# Altium PCB Robot_POWER.PcbDoc (part 1 of 3)
Units mil, origin at the board's own origin, x right, y up, seen from the top; angles counter-clockwise.
Board outline 5791.97 x 4531.5 mil, 4 copper layers (Top Layer, GND02, GND03, Bottom Layer), stack 23.756 mil thick; 192 components, 81 nets, 533 pads, 1202 vias.
Unrouted connection lines stored in the file: 18.
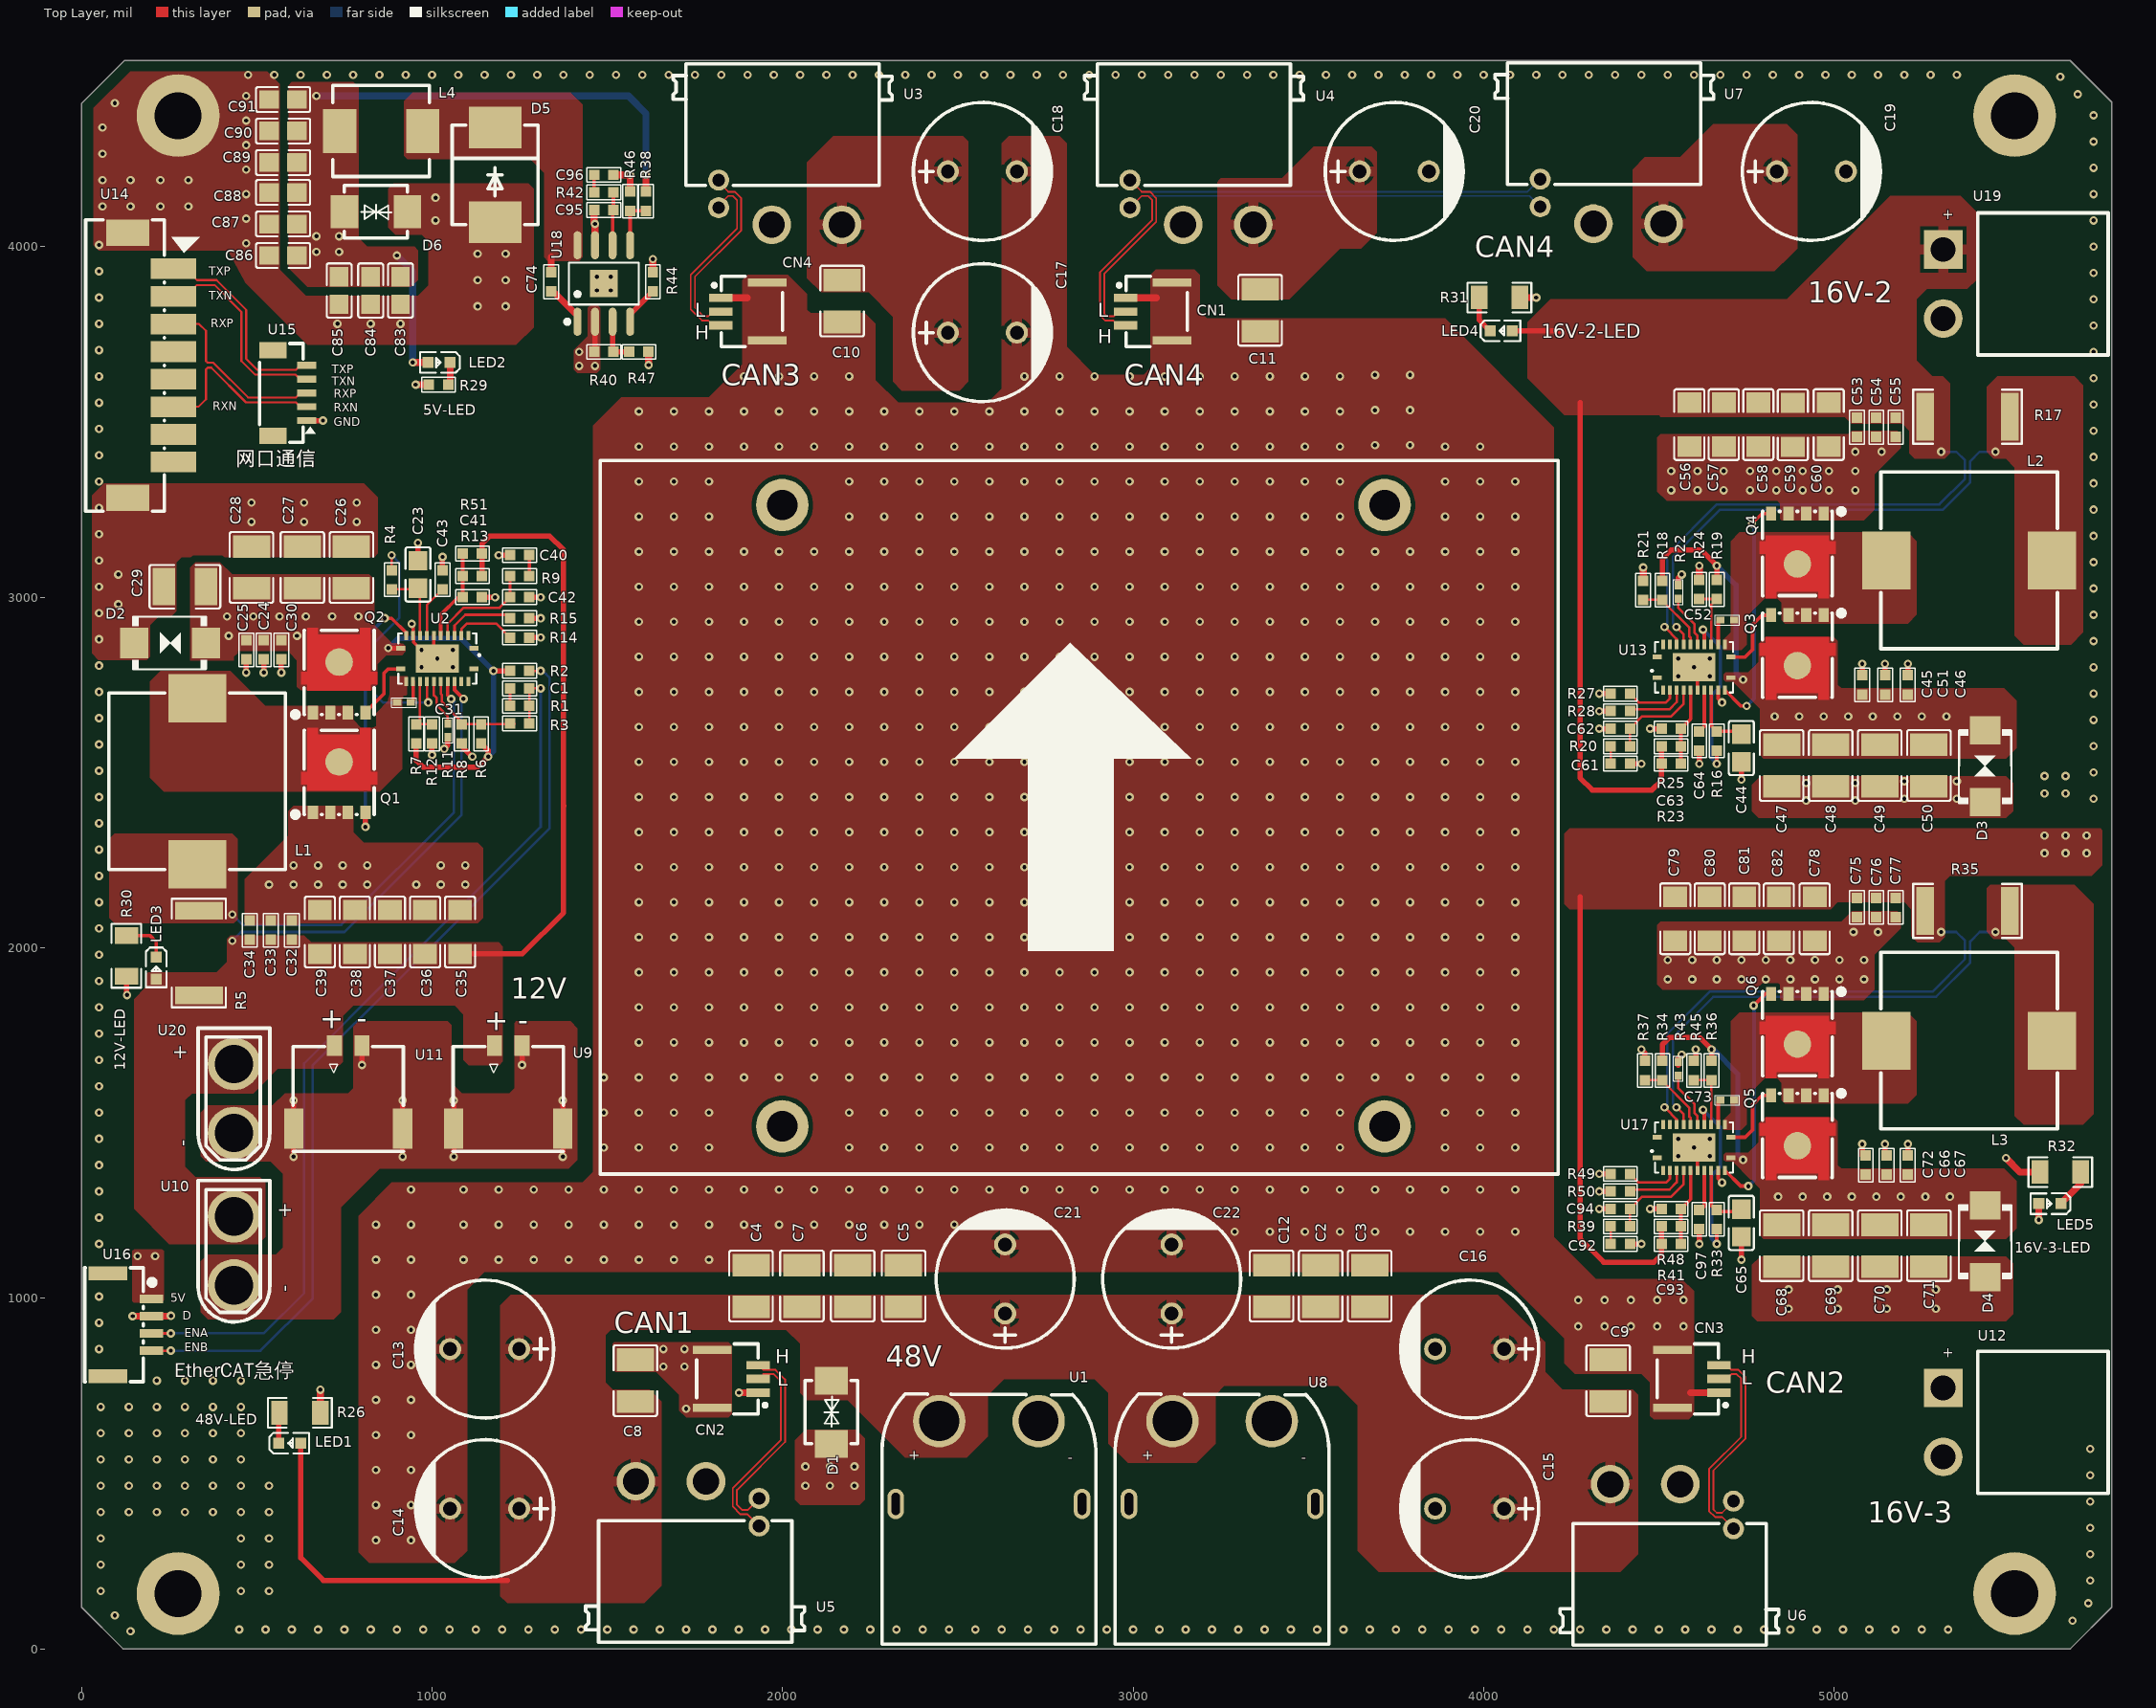
[diagram p0: Top Layer view]
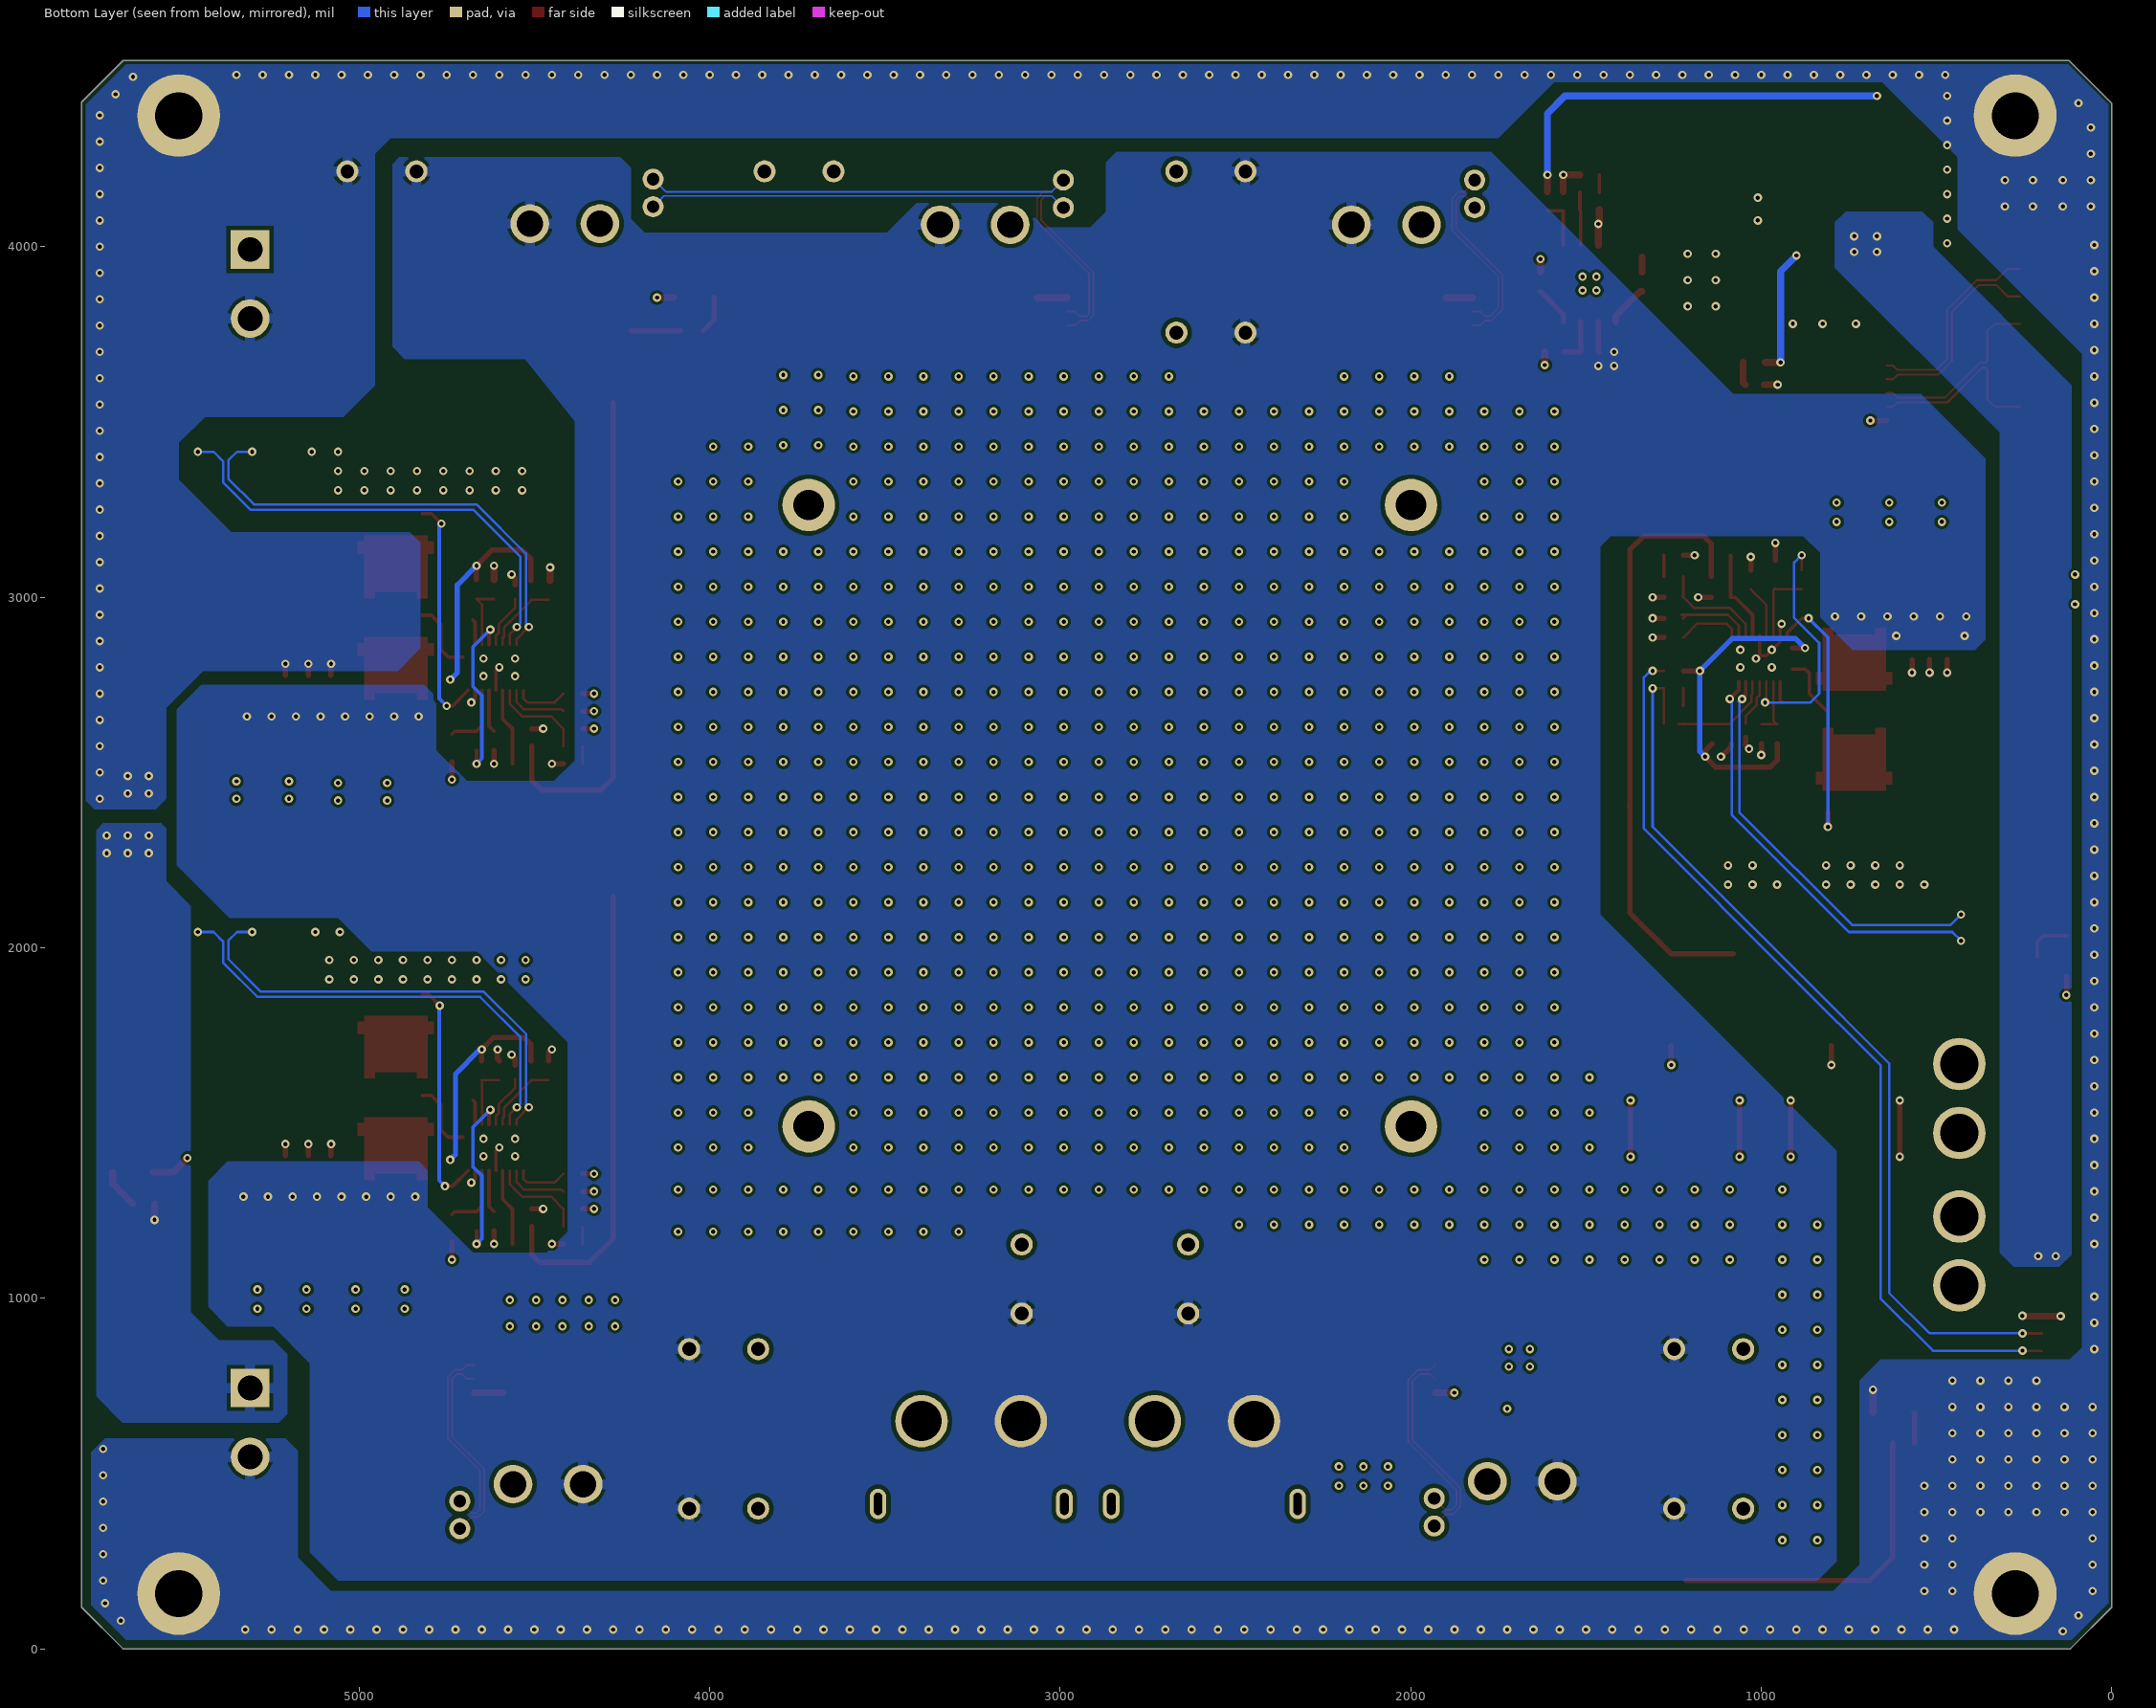
[diagram p1: Bottom Layer view, seen from below]
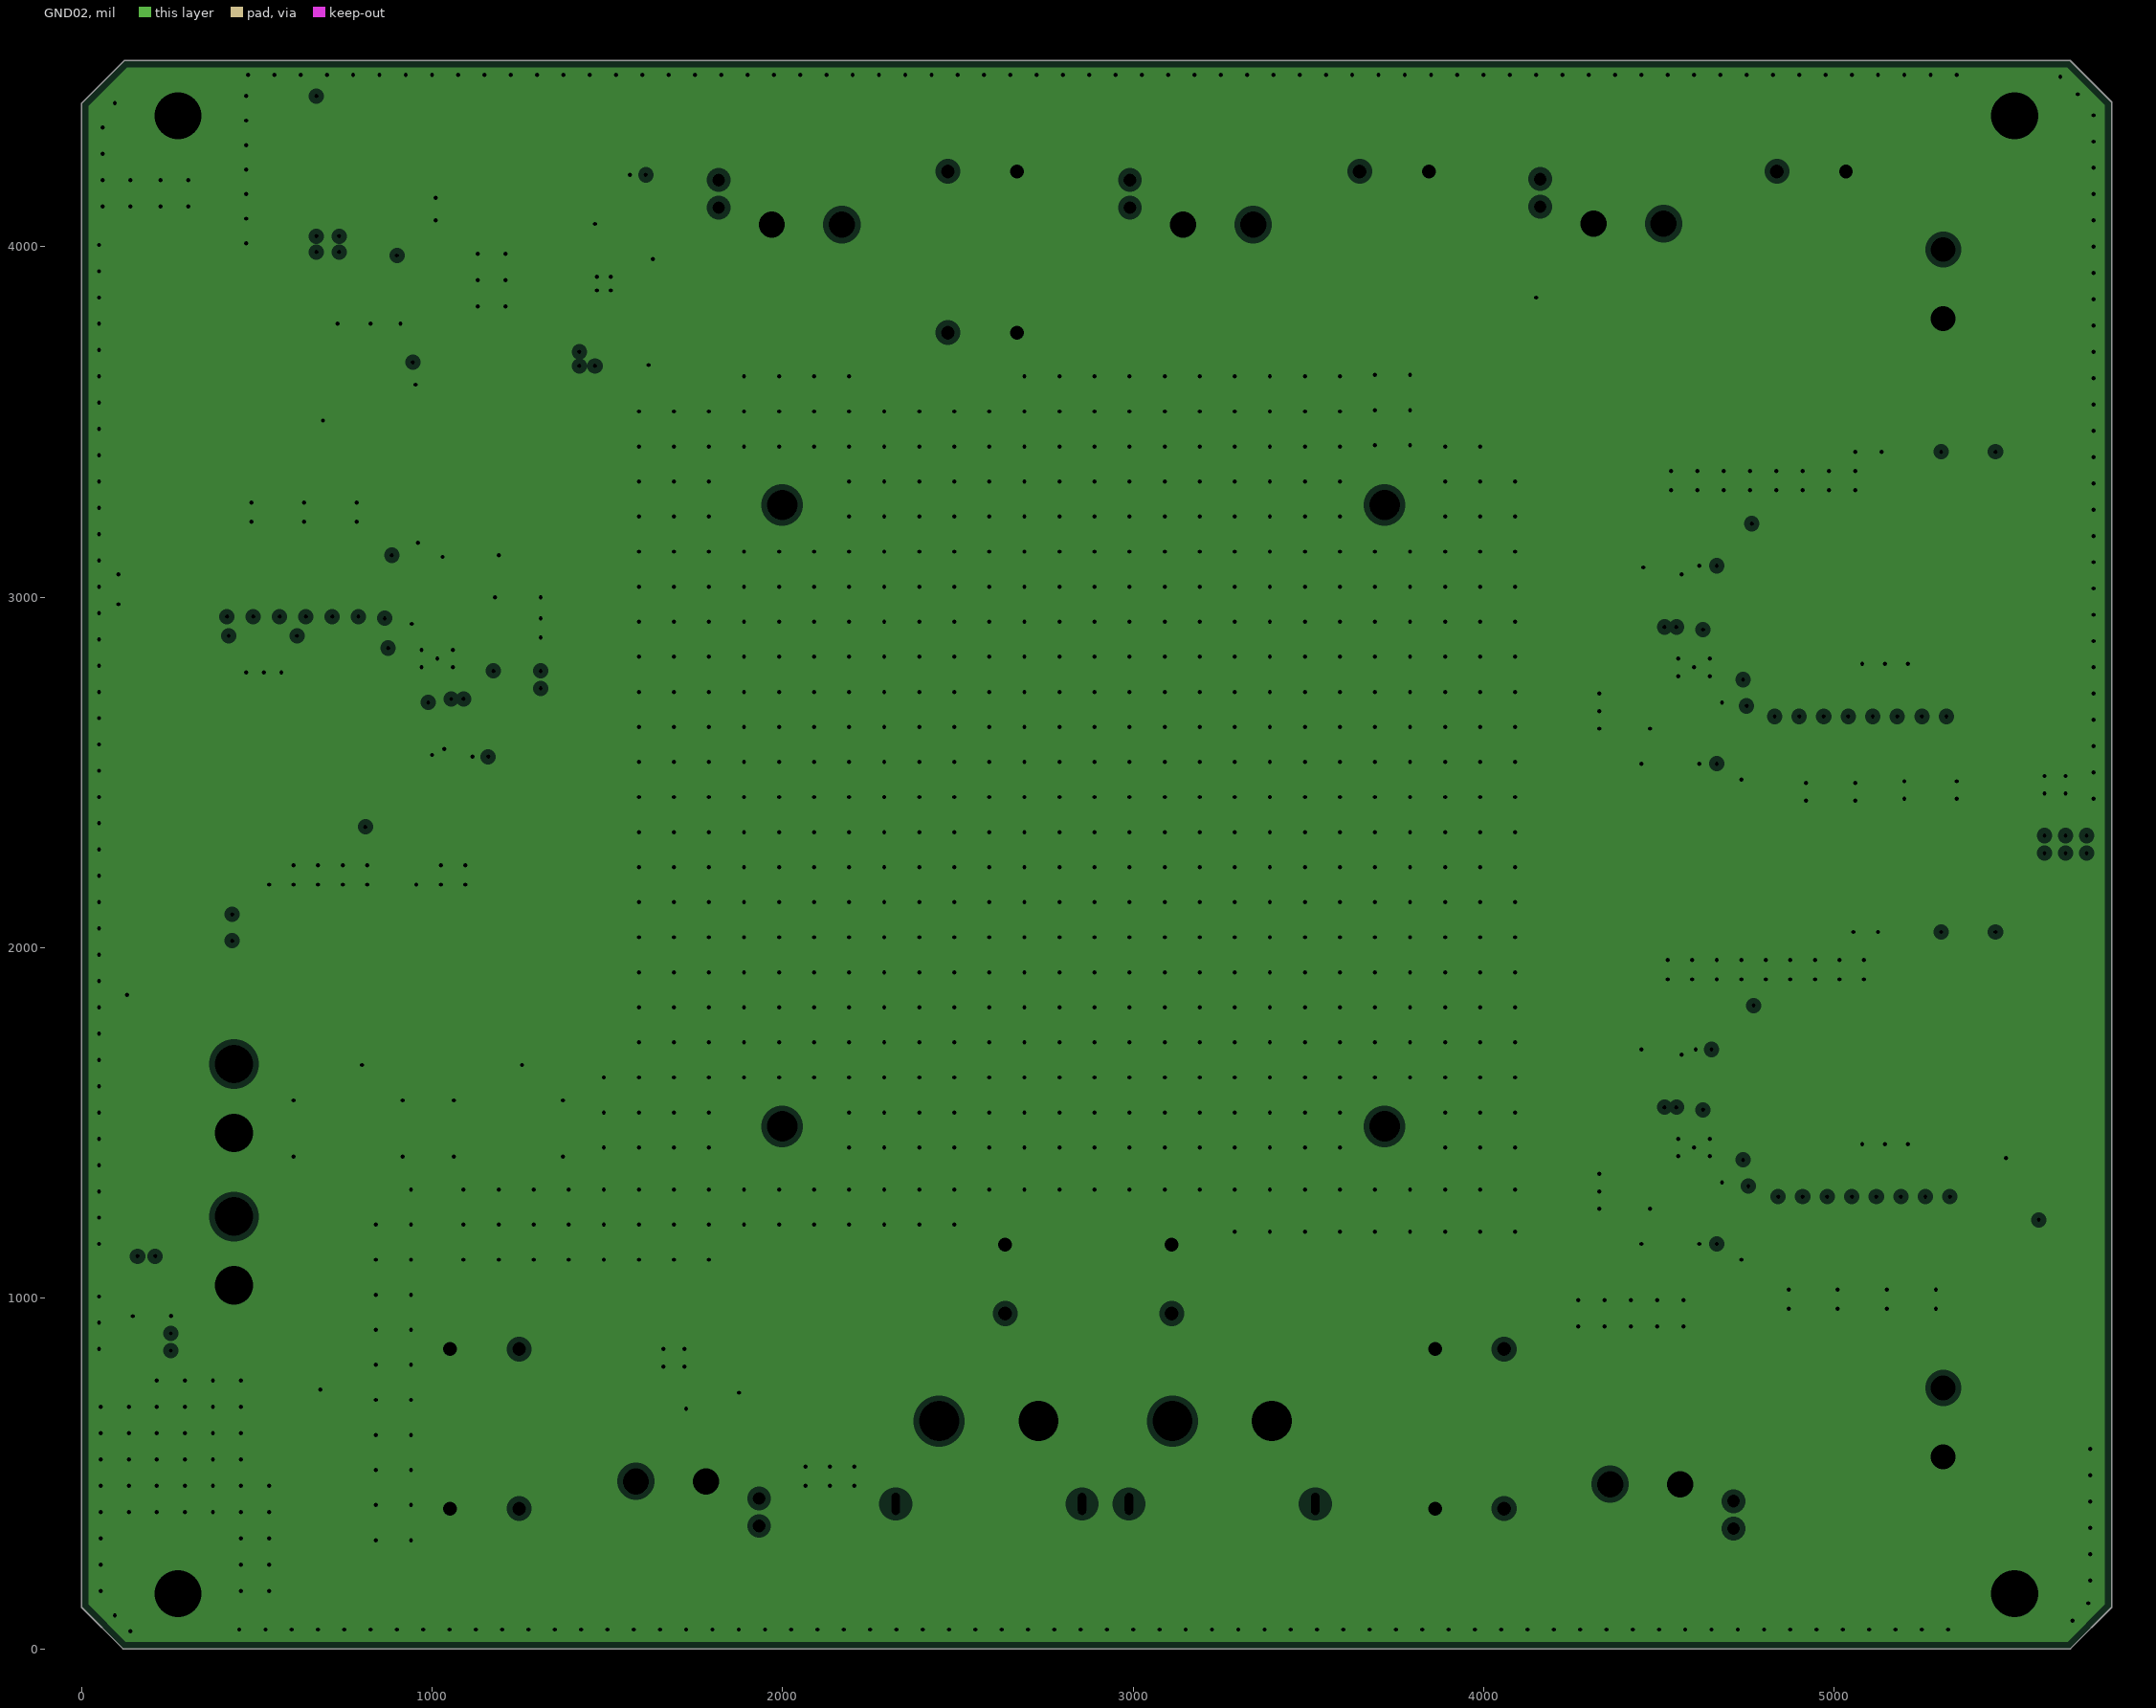
[diagram p2: GND02, clearances drawn from the general rule]
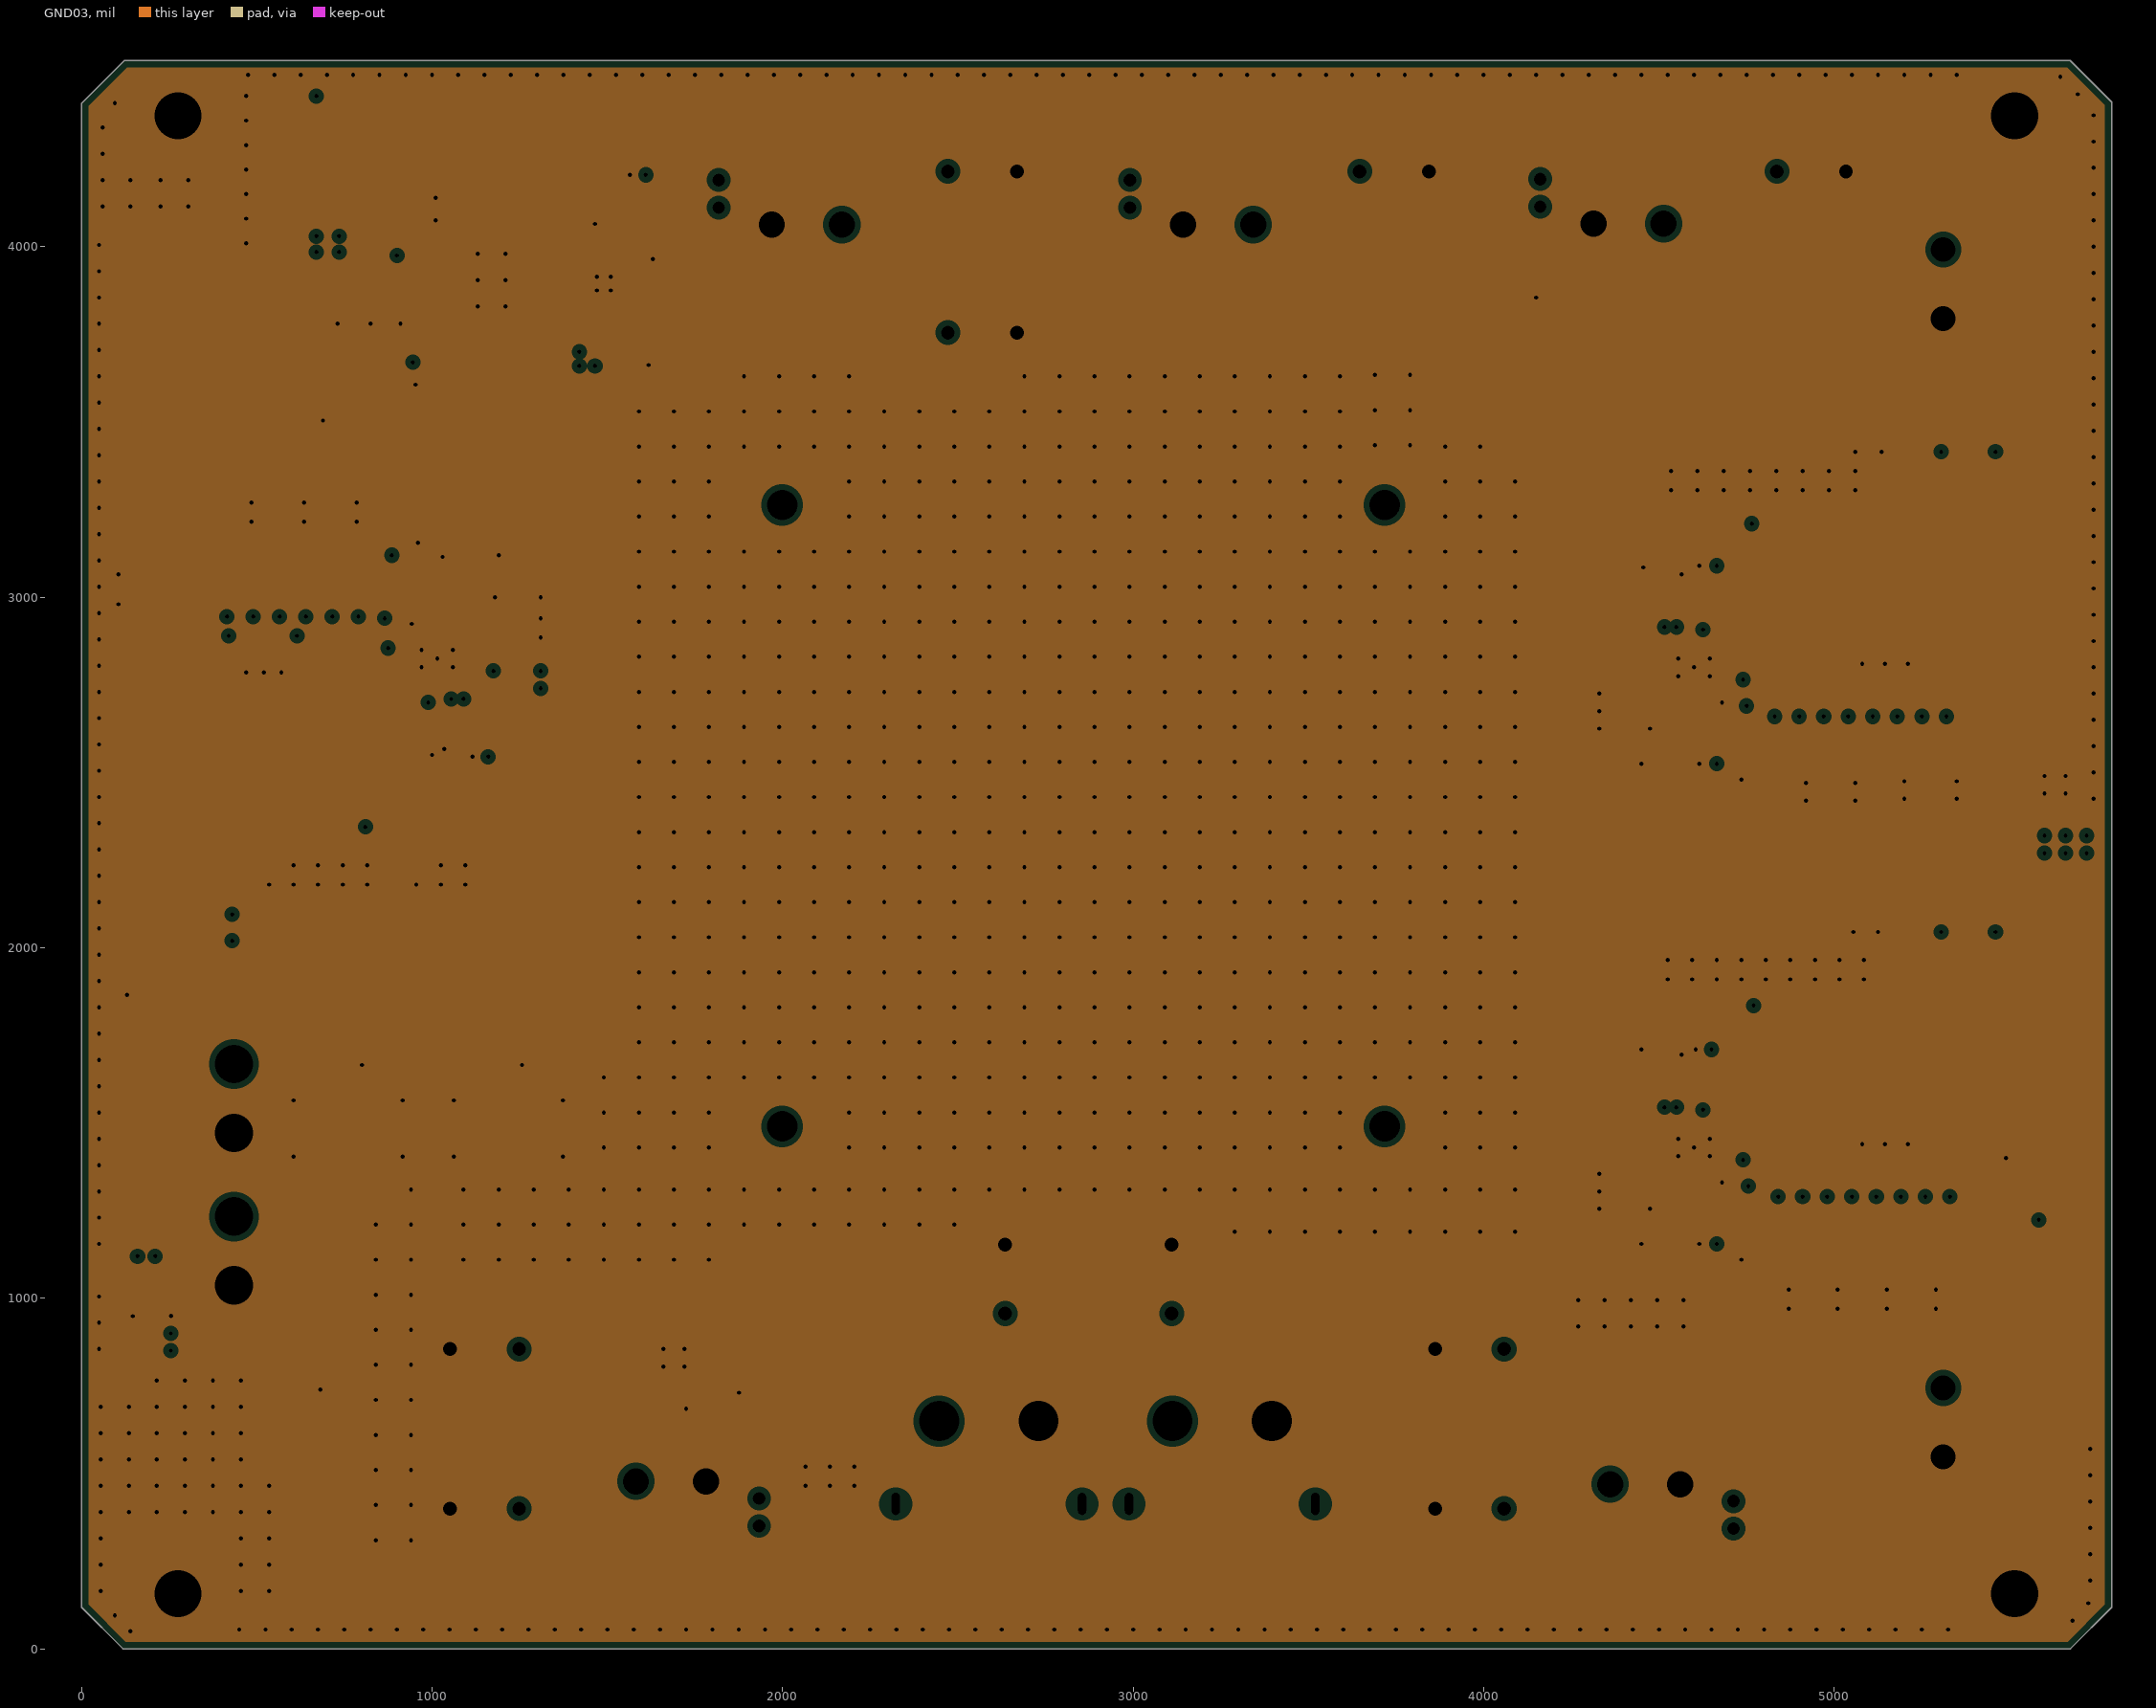
[diagram p3: GND03, clearances drawn from the general rule]
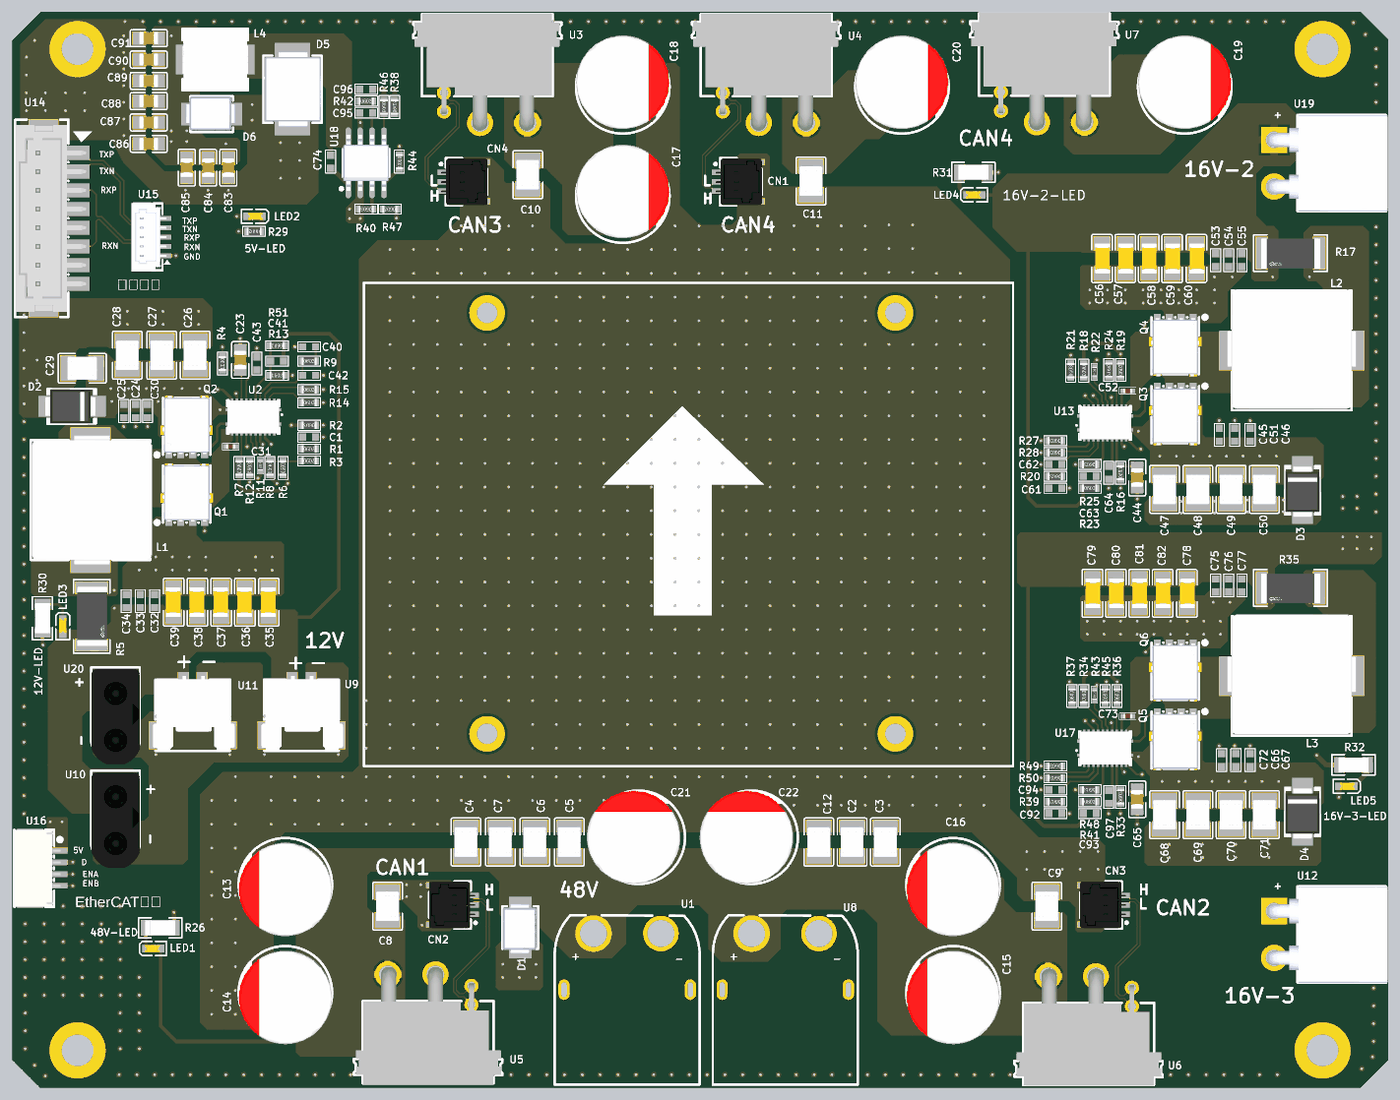
[diagram p5: 3D render of the assembled board from above, using the file's embedded part models]

## Layer stack, top to bottom
Top Solder: solder mask 0.4, Solder Resist, Dk 3.5
Top Layer: signal copper 1.4
Dielectric 2: prepreg 2.8, PP-006, Dk 4.1
GND02: plane copper 1.378, net GND
Dielectric 1: dielectric 12.6, FR-4, Dk 4.8
GND03: plane copper 1.378, net GND
Dielectric 3: prepreg 2.8, PP-006, Dk 4.1
Bottom Layer: signal copper 1.4
Bottom Solder: solder mask 0.4, Solder Resist, Dk 3.5

## Board outline
0,118.11 118.11,0 5673.86,0 5791.97,118.11 5791.97,4412.76 5673.23,4531.5 122.05,4531.5 0,4409.45

## Design rules (kind name [scope] priority, off if disabled: settings)
Clearance [All] p1: gap=10 ignorepadtopadclearanceinfootprint=FALSE except(7: Arc-Arc Arc-Track Arc-THPad Track-Track Track-THPad; 8: Arc-SMDPad Arc-Via Track-SMDPad Track-Via SMDPad-SMDPad SMDPad-Via THPad-Via Via-Fill Via-Poly Via-Region; 12: Arc-Fill Arc-Poly Arc-Region Track-Fill Track-Poly Track-Region THPad-Fill THPad-Poly THPad-Region; 20: Fill-Fill Fill-Poly Fill-Region Poly-Poly Poly-Region Region-Region)
DiffPairsRouting 100ohm [InDifferentialPairClass('100OHM')] p1: maxlimit=8 minlimit=8 mostfreqgap=8 toplayer_minwidth=6 toplayer_maxwidth=6 toplayer_prefwidth=6 bottomlayer_minwidth=6 bottomlayer_maxwidth=6 bottomlayer_prefwidth=6 maxuncoupledlength=500
DiffPairsRouting 120ohm [InDifferentialPairClass('120OHM')] p2: maxlimit=7 minlimit=7 mostfreqgap=7 toplayer_minwidth=5 toplayer_maxwidth=5 toplayer_prefwidth=5 bottomlayer_minwidth=5 bottomlayer_maxwidth=5 bottomlayer_prefwidth=5 maxuncoupledlength=500
MatchedLengths [InDifferentialPairClass('All Differential Pairs')] p1: tolerance=5 checknetsindiffpair=TRUE checkdiffpairvsdiffpair=FALSE checkxsignals=FALSE checkothers=FALSE
PlaneClearance [All] p1: clearance=16
PlaneConnect PlaneConnect_PWR [InPadClass('PWR')] p1: planeconnectstyle=Direct reliefexpansion=20 reliefentries=4 reliefconductorwidth=10 reliefairgap=10
PlaneConnect [All] p2: planeconnectstyle=Direct reliefexpansion=20 reliefentries=4 reliefconductorwidth=30 reliefairgap=10
PolygonConnect PolygonConnect_PWR [InPadClass('PWR')] p1: connectstyle=Direct reliefconductorwidth=10 reliefentries=4 polygonreliefangle="90 Angle" airgapwidth=10
PolygonConnect [All] p2: connectstyle=Direct reliefconductorwidth=30 reliefentries=4 polygonreliefangle="90 Angle" airgapwidth=10
RoutingVias [All] p1: holewidth=12 width=24 viastyle="Through Hole" minholewidth=12 minwidth=24 maxholewidth=12 maxwidth=24
SilkToSilkClearance [All] p1: silktosilkclearance=0.1
SilkToSolderMaskClearance [IsPad] p1: minsilkscreentomaskgap=0.1 clearancetoexposedcopper=TRUE
SolderMaskExpansion [IsVia And Not (Name Like 'Test*')] p1: expansion=-24 istentingtop=TRUE
Width [All] p1: maxlimit=100 minlimit=5 preferedwidth=8 minimp=50.000000 maximp=50.000000 favimp=50.000000
25 further rules are at their usual default settings.

## Components (designator, comment, footprint, x,y, rotation, side; value= is the part's Value field where it differs from the comment)
C1 "C0603/27pF/10%" C0603 1250,2740 r180 top
C2 "C1210/10uF/10%" C1210 3535,1035 r270 top value=10uF
C3 "C1210/10uF/10%" C1210 3675,1035 r270 top value=10uF
C4 "C1210/10uF/10%" C1210 1910,1035 r270 top value=10uF
C5 "C1210/10uF/10%" C1210 2345,1035 r270 top value=10uF
C6 "C1210/10uF/10%" C1210 2200,1035 r270 top value=10uF
C7 "C1210/10uF/10%" C1210 2055,1035 r270 top value=10uF
C8 "C1210/10uF/10%" C1210 1580,765 r270 top value=10uF
C9 "C1210/10uF/10%" c1210 4355,765 r270 top value=10uF
C10 "C1210/10uF/10%" C1210 2170,3845 r90 top value=10uF
C11 "C1210/10uF/10%" C1210 3362.2,3818.9 r90 top value=10uF
C12 "C1210/10uF/10%" C1210 3395,1035 r270 top value=10uF
C13 "100uF" CAP-TH_BD10.0-P5.00-D0.6-FD_2 1150,855 r180 top
C14 "100uF" CAP-TH_BD10.0-P5.00-D0.6-FD_2 1150,400 r180 top
C15 "100uF" CAP-TH_BD10.0-P5.00-D0.6-FD_2 3960,400 r180 top
C16 "100uF" CAP-TH_BD10.0-P5.00-D0.6-FD_2 3960,855 r180 top
C17 "100uF" CAP-TH_BD10.0-P5.00-D0.6-FD_2 2570,3755 r0 top
C18 "100uF" CAP-TH_BD10.0-P5.00-D0.6-FD_2 2570,4215 r0 top
C19 "100uF" CAP-TH_BD10.0-P5.00-D0.6-FD_2 4935,4215 r0 top
C20 "100uF" CAP-TH_BD10.0-P5.00-D0.6-FD_2 3745,4215 r0 top
C21 "100uF" CAP-TH_BD10.0-P5.00-D0.6-FD_2 2635,1055 r90 top
C22 "100uF" CAP-TH_BD10.0-P5.00-D0.6-FD_2 3110,1055 r90 top
C23 "0805/2.2UF/50V" C0805 960,3065 r90 top
C24 "10nF/0603/100V" C0603 520,2850 r90 top
C25 "10pF/0603/100V" C0603 470,2850 r90 top
C26 "C1210/4.7UF/100V/X7S" C1210 770,3085 r90 top
C27 "C1210/4.7UF/100V/X7S" C1210 630,3085 r90 top
C28 "C1210/4.7UF/100V/X7S" C1210 485,3085 r90 top
C29 "C1210/4.7UF/100V/X7S" C1210 295,3030 r180 top
C30 "0.1uF/0603/100V" C0603 570,2850 r90 top
C31 "0603/0.1uF/100V" C0402 920,2700 r0 top
C32 "0.1uF/0603/50V" C0603 600,2050 r270 top
C33 "10nF/0603/50V" C0603 540,2050 r270 top
C34 "10pF/0603/50V" C0603 480,2050 r270 top
C35 "C1206/22UF/25V/X5R" C1206 1080,2045 r90 top
C36 "C1206/22UF/25V/X5R" C1206 980,2045 r90 top
C37 "C1206/22UF/25V/X5R" C1206 880,2045 r90 top
C38 "C1206/22UF/25V/X5R" C1206 780,2045 r90 top
C39 "C1206/22UF/25V/X5R" C1206 680,2045 r90 top
C40 "6.8NF/0603/50V" C0603 1250,3120 r180 top
C41 "22PF/0603/50V" C0603 1115,3060 r180 top
C42 "100PF/0603/50V" C0603 1250,3000 r0 top
C43 "0.1uF/0603/100V" C0603 1030,3050 r270 top
C44 "0805/2.2UF/50V" C0805 4735,2570 r270 top
C45 "10nF/0603/100V" C0603 5080,2750 r270 top
C46 "10pF/0603/100V" C0603 5210,2750 r270 top
C47 "C1210/4.7UF/100V/X7S" C1210 4850,2520 r270 top
C48 "C1210/4.7UF/100V/X7S" C1210 4990,2520 r270 top
C49 "C1210/4.7UF/100V/X7S" C1210 5130,2520 r270 top
C50 "C1210/4.7UF/100V/X7S" C1210 5270,2520 r270 top
C51 "0.1uF/0603/100V" C0603 5145,2750 r270 top
C52 "0603/0.1uF/100V" C0402 4695,2935 r180 top
C53 "0.1uF/0603/50V" C0603 5065,3485 r90 top
C54 "10nF/0603/50V" C0603 5120,3485 r90 top
C55 "10pF/0603/50V" C0603 5175,3485 r90 top
C56 "C1206/22UF/25V/X5R" C1206 4586.61,3492.42 r270 top
C57 "C1206/22UF/25V/X5R" C1206 4685.04,3492.42 r270 top
C58 "C1206/22UF/25V/X5R" C1206 4783.46,3492.42 r270 top
C59 "C1206/22UF/25V/X5R" C1206 4881.89,3491.83 r270 top
C60 "C1206/22UF/25V/X5R" C1206 4984.25,3492.42 r270 top
C61 "6.8NF/0603/50V" C0603 4390,2525 r0 top
C62 "100PF/0603/50V" C0603 4390,2625 r180 top
C63 "22PF/0603/50V" C0603 4535,2575 r0 top
C64 "0.1uF/0603/100V" C0603 4615,2590 r90 top
C65 "0805/2.2UF/50V" C0805 4735,1215 r270 top
C66 "10nF/0603/100V" C0603 5150,1380 r270 top
C67 "10pF/0603/100V" C0603 5210,1380 r270 top
C68 "C1210/4.7UF/100V/X7S" C1210 4850,1150 r270 top
C69 "C1210/4.7UF/100V/X7S" C1210 4990,1150 r270 top
C70 "C1210/4.7UF/100V/X7S" C1210 5130,1150 r270 top
C71 "C1210/4.7UF/100V/X7S" C1210 5270,1150 r270 top
C72 "0.1uF/0603/100V" C0603 5090,1380 r270 top
C73 "0603/0.1uF/100V" C0402 4695,1565 r180 top
C74 "C0603/100nF/10%" C0603 1340,3900 r90 top value=100nF
C75 "0.1uF/0603/50V" C0603 5065,2115 r90 top
C76 "10nF/0603/50V" C0603 5120,2115 r90 top
C77 "10pF/0603/50V" C0603 5175,2115 r90 top
C78 "C1206/22UF/25V/X5R" C1206 4944.21,2082.41 r270 top
C79 "C1206/22UF/25V/X5R" C1206 4546.57,2082.7 r270 top
C80 "C1206/22UF/25V/X5R" C1206 4645,2082.7 r270 top
C81 "C1206/22UF/25V/X5R" C1206 4743.43,2082.7 r270 top
C82 "C1206/22UF/25V/X5R" C1206 4841.85,2082.41 r270 top
C83 "C0805/10uF/10%" C0805 910,3875 r90 top value=10uF
C84 "C0805/10uF/10%" C0805 825,3875 r90 top value=10uF
C85 "C0805/10uF/10%" C0805 735,3875 r90 top value=10uF
C86 "C0805/10uF/10%" C0805 575,3975 r0 top value=10uF
C87 "C0805/10uF/10%" C0805 575,4065 r0 top value=10uF
C88 "C0805/10uF/10%" C0805 575,4155 r0 top value=10uF
C89 "C0805/10uF/10%" C0805 575,4240 r0 top value=10uF
C90 "C0805/10uF/10%" C0805 575,4330 r0 top value=10uF
C91 "C0805/10uF/10%" C0805 575,4420 r0 top value=10uF
C92 "6.8NF/0603/50V" C0603 4390,1155 r0 top
C93 "22PF/0603/50V" C0603 4535,1155 r0 top
C94 "100PF/0603/50V" C0603 4390,1255 r180 top
C95 "C0603/47pF/10%" C0603 1490,4105 r0 top value=47pF
C96 "C0603/10nF/10%" C0603 1490,4205 r180 top value=10nF
C97 "0.1uF/0603/100V" C0603 4615,1225 r90 top
CN1 "SM03B-NSHSS-TB(LF)(SN)" CONN-SMD_3P-P1.00_BM03B-NSHSS-TBT 3045,3815 r90 top
CN2 "SM03B-NSHSS-TB(LF)(SN)" CONN-SMD_3P-P1.00_BM03B-NSHSS-TBT 1865,770 r270 top
CN3 "SM03B-NSHSS-TB(LF)(SN)" CONN-SMD_3P-P1.00_BM03B-NSHSS-TBT 4605,770 r270 top
CN4 "SM03B-NSHSS-TB(LF)(SN)" CONN-SMD_3P-P1.00_BM03B-NSHSS-TBT 1890,3815 r90 top
D1 "SMBJ58CA" SMB_L4.5-W3.6-LS5.2-BI 2065,640 r270 top
D2 "SMBJ60CA/TR13" SMB_L4.3-W3.6-LS5.4-BI 245,2835 r180 top
D3 "SMBJ60CA/TR13" SMB_L4.3-W3.6-LS5.4-BI 5465,2510 r270 top
D4 "SMBJ60CA/TR13" SMB_L4.3-W3.6-LS5.4-BI 5465,1155 r270 top
D5 "B540C-13-F" SMC_L7.1-W6.2-LS8.1-RD 1180,4205 r270 top
D6 "SMBJ5.0CA" SMB_L4.5-W3.6-LS5.2-BI 805,4173.74 r180 top
L1 "6.8UH" IND-SMD_L12.8-W12.8-LS13.8_CYA1265 330,2475 r270 top
L2 "6.8UH" IND-SMD_L12.8-W12.8-LS13.8_CYA1265 5385,3105 r0 top
L3 "6.8UH" IND-SMD_L12.8-W12.8-LS13.8_CYA1265 5385,1735 r0 top
L4 "15uH" IND-SMD_L7.0-W6.6 855,4330 r180 top
LED1 "KT-0603R" LED0603-RD_RED 594.5,586.48 r0 top
LED2 "KT-0603R" LED0603-RD_RED 1020.29,3670.26 r180 top
LED3 "KT-0603R" LED0603-RD_RED 213.05,1941.99 r270 top
LED4 "KT-0603R" LED0603-RD_RED 4050,3760 r0 top
LED5 "KT-0603R" LED0603-RD_RED 5615,1270 r180 top
Q1 "NVMFS6H848NLT1G" DFN-5_L4.9-W5.9-P1.27-LS6.2-BL 735,2457.5 r0 top
Q2 "NVMFS6H858NLT1G" DFN-5_L4.9-W5.9-P1.27-LS6.2-BL 735,2742.5 r0 top
Q3 "NVMFS6H858NLT1G" DFN-5_L4.9-W5.9-P1.27-LS6.2-BL 4895,2877.5 r180 top
Q4 "NVMFS6H848NLT1G" DFN-5_L4.9-W5.9-P1.27-LS6.2-BL 4895,3167.5 r180 top
Q5 "NVMFS6H858NLT1G" DFN-5_L4.9-W5.9-P1.27-LS6.2-BL 4895,1507.5 r180 top
Q6 "NVMFS6H848NLT1G" DFN-5_L4.9-W5.9-P1.27-LS6.2-BL 4895,1797.5 r180 top
R1 "0603/14.7kΩ/1%" R0603 1250,2690 r0 top value=14.7kΩ
R2 "0603/402kΩ/1%" R0603 1250,2790 r180 top value=402kΩ
R3 "0603/10KΩ/1%" R0603 1250,2640 r0 top
R4 "0603/20K/1%" R0603 885,3050 r270 top
R5 "2512/5mΩ/1%" R2512 335,1985 r90 top
R6 "0603/100K/1%" R0603 1140,2610 r90 top
R7 "0603/20K/1%" R0603 955,2610 r270 top
R8 "0603/22K/1%" R0603 1085,2610 r270 top
R9 "0603/4.75K/1%" R0603 1250,3060 r0 top
R11 "0402/0R%" R0402 1045,2620 r270 top
R12 "0603/20K/1%" R0603 1000,2610 r90 top
R13 "0603/4.3K/1%" R0603 1115,3000 r0 top
R14 "0603/54.9K/1%" R0603 1250,2885 r0 top
R15 "0603/54.9K/1%" R0603 1250,2940 r0 top
R16 "0603/20K/1%" R0603 4665,2590 r90 top
R17 "2512/5mΩ/1%" R2512 5380,3515 r0 top
R18 "0603/100K/1%" R0603 4510,3020 r270 top
R19 "0603/20K/1%" R0603 4665,3022.5 r90 top
R20 "0603/4.75K/1%" R0603 4390,2575 r180 top
R21 "0603/22K/1%" R0603 4455,3020 r90 top
R22 "0402/0R%" R0402 4555,3015 r90 top
R23 "0603/82K/1%" R0603 4535,2525 r0 top
R24 "0603/20K/1%" R0603 4615,3022.5 r270 top
R25 "0603/4.3K/1%" R0603 4535,2625 r180 top
R26 "1206/10kΩ/1%" R1206 622.9,673.23 r0 top value=10kΩ
R27 "0603/54.9K/1%" R0603 4390,2725 r180 top
R28 "0603/54.9K/1%" R0603 4390,2675 r180 top
R29 "0603/510Ω/1%" R0603 1018.5,3606.5 r180 top value=510Ω
R30 "1206/4.7kΩ/1%" R1206 128.05,1976.99 r270 top value=3.3kΩ
R31 "1206/4.7kΩ/1%" R1206 4045,3855 r0 top value=3.3kΩ
R32 "1206/4.7kΩ/1%" R1206 5645,1360 r180 top value=3.3kΩ
R33 "0603/20K/1%" R0603 4665,1225 r90 top
R34 "0603/100K/1%" R0603 4510,1650 r270 top
R35 "2512/5mΩ/1%" R2512 5380,2105 r0 top
R36 "0603/20K/1%" R0603 4650,1650 r90 top
R37 "0603/22K/1%" R0603 4460,1650 r90 top
R38 "0603/53.6kΩ/1%" R0603 1610,4130 r90 top value=53.6kΩ
R39 "0603/4.75K/1%" R0603 4390,1205 r180 top
R40 "0603/511kΩ/1%" R0603 1490,3700 r180 top value=511kΩ
R41 "0603/82K/1%" R0603 4535,1205 r0 top
R42 "0603/12.1kΩ/1%" R0603 1490,4155 r0 top value=12.1kΩ
R43 "0402/0R%" R0402 4555,1654.68 r90 top
R44 "0603/162kΩ/1%" R0603 1630,3900 r270 top value=162kΩ
R45 "0603/20K/1%" R0603 4600,1650 r270 top
R46 "0603/10.2kΩ/1%" R0603 1565,4130 r270 top value=10.2kΩ
R47 "0603/82.5kΩ/1%" R0603 1590,3700 r180 top value=82.5kΩ
R48 "0603/4.3K/1%" R0603 4535,1255 r180 top
R49 "0603/54.9K/1%" R0603 4390,1355 r180 top
R50 "0603/54.9K/1%" R0603 4390,1305 r180 top
R51 "0603/60.2K/1%" R0603 1115,3125 r180 top
U1 "XT60PW-M30.G.Y" CONN-TH_XT60PW-M 2588.58,531.49 r90 top locked
U2 "LM5148RGYR" VQFN-24_L5.5-W3.5-P0.50-BL-EP-2 1015,2825 r180 top
U3 "XT30PW(2+2)-M.G/B" CONN-TH_4P-XT30PW-M 2169.29,4062.99 r180 top locked
U4 "XT30PW(2+2)-M.G/B" CONN-TH_4P-XT30PW-M 3342.52,4062.99 r180 top locked
U5 "XT30PW(2+2)-M.G/B" CONN-TH_4P-XT30PW-M 1581.5,477.56 r0 top locked
U6 "XT30PW(2+2)-M.G/B" CONN-TH_4P-XT30PW-M 4361.02,469.69 r0 top locked
U7 "XT30PW(2+2)-M.G/B" CONN-TH_4P-XT30PW-M 4512.99,4065.75 r180 top locked
U8 "XT60PW-M30.G.Y" CONN-TH_XT60PW-M 3253.94,531.49 r90 top locked
U9 "CONN-SMD_2053380002" CONN-SMD_2053380002 1217.41,1602.36 r0 top locked
U10 "XT30UW-F.G.Y" CONN-TH_XT30UW-F.G.Y 435,1135 r90 top
U11 "CONN-SMD_2053380002" CONN-SMD_2053380002 760.72,1602.36 r0 top locked
U12 "XT30PW-M36" CONN-TH_2P-P5.00_XT30PW-M36 5311.02,645.67 r90 top locked
U13 "LM5148RGYR" VQFN-24_L5.5-W3.5-P0.50-BL-EP-2 4600,2800 r0 top
U14 "bx-ph2.0-8plt" CONN-SMD_8P-P2.00_BX-PH2.0-8PLT 196.85,3661.42 r270 top locked
U15 "BX-SH1.0-5PLT" CONN-SMD_5P-P1.00_BX-SH1.0-5PLT 594.49,3582.68 r90 top locked
U16 "WAFER-GH1.25-4PWB" CONN-SMD_4P-P1.25_XUNPU_WAFER-GH1.25-4PWB 137.8,924.37 r270 top locked
U17 "LM5148RGYR" VQFN-24_L5.5-W3.5-P0.50-BL-EP-2 4600,1430 r0 top
U18 "TPS54560DDAR" SOIC-8_L5.0-W4.0-P1.27-LS6.0-BL-EP2.0 1490,3895 r0 top
U19 "XT30PW-M36" CONN-TH_2P-P5.00_XT30PW-M36 5311.03,3893.71 r90 top locked
U20 "XT30UW-F.G.Y" CONN-TH_XT30UW-F.G.Y 435,1570 r90 top

## Footprints (in the part's own frame and the unit in brackets; to place one, negate y for a bottom-side part, rotate by r counter-clockwise, add the part's x,y. Pads: shape width x height; smd on the part's side, far side on the other; paste and mask are expansions set on the pad)
C0402 [mm] "Chip Capacitor, Body 1.0x0.5mm, IPC High Density"
  rect 0.6x0.5 smd: 1(-0.5,0) 2(0.5,0)
  silkscreen extent -0.9,-0.35 0.9,0.35, body extent -0.5,-0.25 0.5,0.25, height 0.48
C0603 [mil] "Capacitor"
  rect 30x30 smd: 1(-27.5,0) 2(27.5,0)
  silkscreen extent -48,-21 48,21, body extent -35,-15 35,15, height 33
C0805 [mm]
  rect 1.41x1.35 smd paste-100 mask+0.051: 1(-1,0) 2(1,0)
  silkscreen extent -1.96,-0.9 1.96,0.9, body extent -1,-0.65 1,0.65, height 1.3
C1206 [mm] "C1206"
  rect 1.485x1.728 smd paste-100 mask+0.051: 1(-1.593,0) 2(1.593,0)
  silkscreen extent -2.56,-1.09 2.56,1.09, body extent -1.6,-0.75 1.6,0.85, height 1.3
C1210 [mm]
  rect 1.635x2.7 smd paste-100 mask+0.051: 1(-1.517,0) 2(1.517,0)
  silkscreen extent -2.56,-1.58 2.56,1.58, body extent -1.6,-1.25 1.6,1.25, height 2.5
c1210 [mm]
  rect 1.635x2.7 smd paste-100 mask+0.051: 1(-1.517,0) 2(1.517,0)
  silkscreen extent -2.56,-1.58 2.56,1.58, body extent -1.6,-1.25 1.6,1.25, height 2.5
CAP-TH_BD10.0-P5.00-D0.6-FD_2 [mm]
  round 1.6 hole 1: 1(-2.5,0) 2(2.5,0)
  silkscreen extent -5,-5 5.08,5, body extent -5,-4.5 5,5.5, height 13
CONN-SMD_3P-P1.00_BM03B-NSHSS-TBT [mm]
  rect 0.6x1.7 smd paste+0 mask+0.05: 1(1,1.675) 2(0,1.675) 3(-1,1.675)
  rect 0.6x2.8 smd paste+0 mask+0.05: 4(-2.1,-1.675) 5(2.1,-1.675)
  silkscreen extent -2.53,-2.79 2.55,2.29, body extent -2.5,-2.8 2.5,2.15, height 6.05
CONN-SMD_4P-P1.25_XUNPU_WAFER-GH1.25-4PWB [mm]
  rect 0.6x1.7 smd paste+0 mask+0.05: 1(-1.875,1.575) 2(-0.625,1.575) 3(0.625,1.575) 4(1.875,1.575)
  rect 1x2.8 smd paste+0 mask+0.05: 5(3.725,-1.575) 6(-3.725,-1.575)
  silkscreen extent -4.13,-3.27 4.12,1.81, body extent -4.13,-3.25 4.13,1.75, height 4.35
CONN-SMD_5P-P1.00_BX-SH1.0-5PLT [mil]
  rect 19.7x55.1 smd paste+0 mask+2: 1(-78.7,-48.2) 2(-39.3,-48.2) 3(0,-48.2) 4(39.4,-48.2) 5(78.8,-48.2)
  rect 47.2x78.7 smd paste+0 mask+2: 6(122.1,48.2) 7(-122,48.2)
  silkscreen extent -141,-73 141,87, body extent -145,-55 145,93, height 174
CONN-SMD_8P-P2.00_BX-PH2.0-8PLT [mil]
  rect 59.1x129.9 smd paste+0 mask+2: 1(-275.6,65) 2(-196.9,65) 3(-118.1,65) 4(-39.4,65) 5(39.4,65) 6(118.1,65) 7(196.8,65) 8(275.6,65)
  rect 74.8x122 smd paste+0 mask+2: 9(377.9,-64.9) 10(-378,-64.9)
  silkscreen extent -416,-185 416,140, body extent -394,-181 394,115, height 244
CONN-SMD_2053380002 [mm]
  rect 1.1x1.5 smd paste+0 mask+0.05: 1(-1,3) 2(1,3)
  rect 1.4x2.9 smd paste+0 mask+0.05: 3(-3.95,-3) 4(3.95,-3)
  silkscreen extent -4,-4.65 4,2.95, body extent -4.28,-4.6 4.47,3.35, height 2.6
CONN-TH_2P-P5.00_XT30PW-M36 [mm]
  rect 2.8x2.8 hole 1.8: 1(2.5,0)
  round 2.8 hole 1.8 copper offset 0,0: 2(-2.5,0)
  silkscreen extent -5.15,-11.95 5.15,-2.5, body extent -5.16,-12.13 5.15,0.77, height 5.3
CONN-TH_4P-XT30PW-M [mil] "XT30 2+2 W"
  round 110.24 hole 74.8 paste-99999 mask+1.97: 1(0,0) 2(200,0)
  round 60 hole 36 paste-99999 mask+1.97: 3(351.57,-48.43) 4(351.57,-127.17)
  silkscreen extent -143,-459 481,-112, body extent -134,-462 476,31, height 205
CONN-TH_XT30UW-F.G.Y [mil]
  round 149.6 hole 110.2: 1(-98.4,0) 2(98.4,0)
  silkscreen extent -202,-102 201,102, body extent -209,-102 193,100, height 370
CONN-TH_XT60PW-M [mm] "XCONN-TH_XT60PW-M"
  round 3.8 hole 2.9 paste-2539.97 mask+0.05: 1(3,-3.6) 2(3,3.6)
  oval 2.2x1.2 hole 0.6 slot 1.6 at 0 deg paste-2539.97 mask+0.05: 3(-3,6.75) 4(-3,-6.75)
  silkscreen extent -13.17,-7.75 4.97,7.75, body extent -13.15,-8 4.95,7.5, height 8.13
DFN-5_L4.9-W5.9-P1.27-LS6.2-BL [mil]
  rect 29.5x39.4 smd: 1(-75,-71.3) 2(-25,-71.3) 3(25,-71.3) 4(75,-71.3)
  round 78.6 smd: 5(0,72.5)
  Top Layer region: -89.8,169.8 -89.8,43.8 -108.5,43.8 -108.5,8.2 -89.8,8.2 -89.8,-8.5 89.7,-8.5 89.7,8.2 108.4,8.2 108.4,43.8 89.7,43.8 89.7,169.8 60.2,169.8 60.2,151.1 -60.3,151.1 -60.3,169.8 -89.8,169.8
  silkscreen extent -133,-85 100,163, body extent -101,-73 101,171, height 40
IND-SMD_L7.0-W6.6 [mil]
  rect 94.5x126 smd: 1(-118.1,0) 2(118.2,0)
  silkscreen extent -138,-130 138,130, body extent -138,-130 138,130, height 111
IND-SMD_L12.8-W12.8-LS13.8_CYA1265 [mm]
  rect 3.5x4.2 smd paste+0 mask+0.05: 1(-6,0) 2(6,0)
  silkscreen extent -6.4,-6.4 6.4,6.4, body extent -6.9,-6.25 6.9,6.56, height 6.5
LED0603-RD_RED [mm]
  rect 0.8x0.8 smd: 1(-0.8,-0.003) 2(0.8,0.003)
  silkscreen extent -1.49,-0.75 1.39,0.76, body extent -0.91,-0.4 0.71,0.41, height 0.71
R0402 [mm]
  rect 0.6x0.5 smd: 1(-0.5,0) 2(0.5,0)
  silkscreen extent -0.9,-0.35 0.9,0.35, body extent -0.5,-0.25 0.5,0.25, height 0.35
R0603 [mil]
  rect 30x30 smd: 1(-27.5,0) 2(27.5,0)
  silkscreen extent -48,-21 48,21, body extent -31,-16 32,16, height 18
R1206 [mil]
  rect 47.5x67 smd paste-3937 mask+2: 1(-58.2,0) 2(58.2,0)
  silkscreen extent -91,-42 91,42, body extent -63,-31 63,32, height 22
R2512 [mil]
  rect 50.49x136.06 smd paste-3937.01 mask+2: 1(-120.72,0) 2(120.72,0)
  silkscreen extent -155,-77 155,77, body extent -124,-65 124,61, height 24
SMB_L4.3-W3.6-LS5.4-BI [mil] "SMBJ60CA/TR13"
  rect 80.61x88.23 smd: 1(-109.69,-34.37) 2(94.35,-34.37)
  silkscreen extent -113,-109 100,41, body extent -106,-106 106,37, height 117
SMB_L4.5-W3.6-LS5.2-BI [mm] "SMBJ60CA"
  rect 2x2.4 smd: 1(-3.175,1.873) 2(1.4,1.873)
  silkscreen extent -3.17,-0.03 1.4,3.78, body extent -3.4,0 1.9,3.6, height 2.35
SMC_L7.1-W6.2-LS8.1-RD [mil]
  rect 119.3x150.4 smd: 1(-135.3,0) 2(135.2,0)
  silkscreen extent -142,-122 142,123, body extent -158,-116 157,120, height 83
SOIC-8_L5.0-W4.0-P1.27-LS6.0-BL-EP2.0 [mil]
  oval 22.6x80.2 smd: 1(-75,-109) 2(-25,-109) 3(25,-109) 4(75,-109) 5(75,109.1) 6(25,109.1) 7(-25,109.1) 8(-75,109.1)
  rect 78.7x78.7 smd: 9(0,0)
  silkscreen extent -110,-115 100,60, body extent -96,-118 96,118, height 67
VQFN-24_L5.5-W3.5-P0.50-BL-EP-2 [mil]
  rect 26.2x13.2 smd: 1(-104.6,-29.5) 12(104.7,-29.5) 13(104.7,29.6) 24(-104.6,29.6)
  rect 11x26.2 smd: 2(-88.5,-65.2) 3(-68.9,-65.2) 4(-49.2,-65.2) 5(-29.5,-65.2) 6(-9.8,-65.2) 7(9.9,-65.2) 8(29.6,-65.2) 9(49.2,-65.2) 10(68.9,-65.2) 11(88.6,-65.2) 14(88.6,65.3) 15(68.9,65.3) 16(49.2,65.3) 17(29.6,65.3) 18(9.9,65.3) 19(-9.8,65.3) 20(-29.5,65.3) 21(-49.2,65.3) 22(-68.9,65.3) 23(-88.5,65.3)
  rect 122x80.7 smd: 25(0,0)
  silkscreen extent -123,-72 111,72, body extent -108,-69 109,70, height 40

## Part data
C1: library part CL10B104KB8NNNC, "CL10B104KB8NNNC", Symbol=CL10B104KB8NNNC
C2 C3 C4 C5 C6 C7 C8 C9 C10 C11 C12: library part FS32X106K101EGG, "FS32X106K101EGG", JLCPCB Part Class=扩展库, LCSC Part Name="10uF ±10% 100V", Manufacturer=PSA(信昌电陶), Temperature Coefficient=X7R, Tolerance=±10%, Voltage Rated=100V, Add into BOM=yes, Convert to PCB=yes, Datasheet=https://atta.szlcsc.com/upload/public/pdf/source/20220906/2A42A90825742552985FFB5A7BAB200E.pdf, Device=FS32X106K101EGG, Manufacturer Part=FS32X106K101EGG, Supplier=LCSC, Supplier Footprint=1210, Supplier Part=C5156756, Symbol=FS32X106K101EGG
C13 C14 C15 C16 C19 C20 C21 C22: library part PA100V100M10x12, "C46550452", Equivalent Series Resistance(ESR)=40mΩ@100kHz, JLCPCB Part Class=扩展库, LCSC Part Name="100uF ±20% 100V", Manufacturer=JIERR(捷而瑞), Operating Temperature=-55℃~+105℃, Ripple Current=2.6A@100kHz, Tolerance=±20%, Voltage Rating=100V, Add into BOM=yes, Convert to PCB=yes, Datasheet=https://item.szlcsc.com/datasheet/PA100V100M10x12/48680146.html, Device=PA100V100M10x12, Diameter=10mm, Height - Seated (Max)=12.5mm, Lifetime=2000hrs@105℃, Manufacturer Part=PA100V100M10x12, Supplier=LCSC, Supplier Footprint=插件,D10xL12.5mm, Supplier Part=C46550452, Symbol=PA100V100M10X12, Type=聚合物
C17 C18: library part PA100V100M10x12, Equivalent Series Resistance(ESR)=40mΩ@100kHz, JLCPCB Part Class=扩展库, LCSC Part Name="100uF ±20% 100V", Manufacturer=JIERR(捷而瑞), Operating Temperature=-55℃~+105℃, Ripple Current=2.6A@100kHz, Tolerance=±20%, Voltage Rating=100V, Add into BOM=yes, Convert to PCB=yes, Datasheet=https://item.szlcsc.com/datasheet/PA100V100M10x12/48680146.html, Device=PA100V100M10x12, Diameter=10mm, Height - Seated (Max)=12.5mm, Lifetime=2000hrs@105℃, Manufacturer Part=PA100V100M10x12, Supplier=LCSC, Supplier Footprint=插件,D10xL12.5mm, Supplier Part=C46550452, Symbol=PA100V100M10X12, Type=聚合物
C23 C31 C44 C52 C65 C73: library part CAP2057, "Capacitor", Manufacturer 1="AVX Corporation", Manufacturer Part Number 1=04025A100JAT2A, Operating Temperature="-55C to +125C", Package=0402, Supplier Part Number 1=478-1070-1-ND, Temperature Coeffcient=100ppm/C, Tolerance=5%, Voltage=50V, Category=Capacitor, ComponentLink1Description="SVN Datasheet", ComponentLink1URL=https://chn-vm-apps.microchip.com/mchprepo/parts/Datasheets/C0GNP0-Dielectric.pdf, ComponentLink2Description="Local Datasheet", ComponentLink2URL=C:\ALTIUM_WORK\00001_MCHP-CDB\Datasheets\C0GNP0-Dielectric.pdf, ComponentLink3Description="Open Symbol", ComponentLink3URL="C:\ALTIUM_WORK\00001_MCHP-CDB\Library\LibraryRefs\Capacitor NP.SchLib", ComponentLink4Description="Open Footprint", ComponentLink4URL=C:\ALTIUM_WORK\00001_MCHP-CDB\Library\Footprints\CAP_C_0402.PcbLib, ComponentLink5Description="Open Footprint 2", ComponentLink6Description="Open Footprint 3", ComponentLink7Description="Open Footprint 4", Description_="CAP CER 10pF 50V 5% NP0 SMD 0402", Dev Tools Status=Design, MCHP-ID=CAP2057, Owner="Ciprian Abramov", Populated=YES, Quantity Override=1, Revision=1, Status="MCL Design", Supplier 1=Digi-Key, Symbol="Capacitor NP", Type=Ceramic
C24 C25 C30 C32 C33 C34 C40 C41 C42 C43 C45 C46 C51 C53 C54 C55 C61 C62 C63 C64 C66 C67 C72 C75 C76 C77 C92 C93 C94 C97: library part CAP0373, "Capacitor", Manufacturer 1=Murata, Manufacturer 2="Taiyo Yuden", Manufacturer Part Number 1=GRM21BR61C106KE15L, Manufacturer Part Number 2=EMK212BJ106KG-T, Operating Temperature="+25C to +125C", Package=0805, Supplier Part Number 1=490-3886-1-ND, Temperature Coeffcient=X5R, Tolerance=10%, Voltage=16V, Category=Capacitor, ComponentLink1Description=Datasheet, ComponentLink1URL=https://chn-vm-apps.microchip.com/mchprepo/parts/Datasheets/L0005E.pdf, Description_="CAP CER 10uF 16V 10% X5R SMD 0805", MCHP-ID=CAP0373, Populated=Yes, Quantity Override=1, Revision=1, Status=Production, Supplier 1=Digi-Key, Supplier 2=Digi-Key, Supplier 3=Newark, Supplier Part Number 2=587-1295-1-ND, Supplier Part Number 3=30K5459, Type=Ceramic
C26 C27 C28 C29 C35 C36 C37 C38 C39 C47 C48 C49 C50 C56 C57 C58 C59 C60 C68 C69 C70 C71 C78 C79 C80 C81 C82: library part CGA6M3X7S2A475K200AE, Symbol=CGA6M3X7S2A475K200AE
C74: library part CC0603KRX7R9BB104, "CC0603KRX7R9BB104", JLCPCB Part Class=基础库, LCSC Part Name="100nF ±10% 50V", Manufacturer=YAGEO(国巨), Temperature Coefficient=X7R, Tolerance=±10%, Voltage Rated=50V, Add into BOM=yes, Convert to PCB=yes, Datasheet=https://atta.szlcsc.com/upload/public/pdf/source/20180910/C282072_33301C7F631E79921B82A8DAC6BCC5B3.pdf, Device=CC0603KRX7R9BB104, Manufacturer Part=CC0603KRX7R9BB104, Supplier=LCSC, Supplier Footprint=0603, Supplier Part=C14663, Symbol=CC0603KRX7R9BB104
C83 C84 C85 C86 C87 C88 C89 C90 C91: library part CL21A106KBYQNNE, "CL21A106KBYQNNE", JLCPCB Part Class=扩展库, LCSC Part Name="10uF ±10% 50V", Manufacturer=SAMSUNG(三星), Temperature Coefficient=X5R, Tolerance=±10%, Voltage Rated=50V, Add into BOM=yes, Convert to PCB=yes, Datasheet=https://atta.szlcsc.com/upload/public/pdf/source/20211217/EA547804C3DC63CB0E92325AB8B6CF61.pdf, Device=CL21A106KBYQNNE, Manufacturer Part=CL21A106KBYQNNE, Supplier=LCSC, Supplier Footprint=0805, Supplier Part=C2932476, Symbol=CL21A106KBYQNNE
C95: library part CL10C470JB8NNNC, "CL10C470JB8NNNC", JLCPCB Part Class=基础库, LCSC Part Name="47pF ±5% 50V", Manufacturer=SAMSUNG(三星), Temperature Coefficient=C0G, Tolerance=±5%, Voltage Rated=50V, Add into BOM=yes, Convert to PCB=yes, Datasheet=https://atta.szlcsc.com/upload/public/pdf/source/20160218/1457707763339.pdf, Device=CL10C470JB8NNNC, Manufacturer Part=CL10C470JB8NNNC, Supplier=LCSC, Supplier Footprint=0603, Supplier Part=C1671, Symbol=CL10C470JB8NNNC
C96: library part CC0603KRX7R9BB103, "CC0603KRX7R9BB103", JLCPCB Part Class=扩展库, LCSC Part Name="10nF ±10% 50V", Manufacturer=YAGEO(国巨), Temperature Coefficient=X7R, Tolerance=±10%, Voltage Rated=50V, Add into BOM=yes, Convert to PCB=yes, Datasheet=https://atta.szlcsc.com/upload/public/pdf/source/20181008/C309510_22F155564471FAF6A489F7D68F34234E.pdf, Device=CC0603KRX7R9BB103, Manufacturer Part=CC0603KRX7R9BB103, Supplier=LCSC, Supplier Footprint=0603, Supplier Part=C100042, Symbol=CC0603KRX7R9BB103
D1: "C151267", Clamping Voltage=93.6V, JLCPCB Part Class=扩展库, LCSC Part Name="双向TVS 58V截止 峰值浪涌电流：6.5A@10/1000us", Manufacturer=Littelfuse(美国力特), Operating Temperature=-65℃~+150℃, Peak Pulse Current (Ipp)=6.5A@10/1000us, Peak Pulse Power Dissipation (Ppp)=600W@10/1000us, Reverse Leakage Current (Ir)=1uA, Reverse Stand-Off Voltage (Vrwm)=58V, Voltage - Breakdown=71.2V, Add into BOM=yes, Convert to PCB=yes, Datasheet=https://item.szlcsc.com/datasheet/SMBJ58CA/162607.html, Device=SMBJ58CA, level of protection="IEC 61000-4-4；IEC 61000-4-2", Manufacturer Part=SMBJ58CA, Polarity=双向, Supplier=LCSC, Supplier Footprint=DO-214AA, Supplier Part=C151267, Symbol=SMBJ58CA_C151267, Type=TVS
D2 D3 D4: Clamping Voltage=96.8V, JLCPCB Part Class="Extended Part", LCSC Part Name="60V截止 6.2A峰值脉冲", Manufacturer=Brightking(君耀电子), Peak Pulse Current (Ipp)=6.2A, Peak Pulse Power Dissipation (Ppp)=600W, Reverse Stand-Off Voltage (Vrwm)=60V, Voltage - Breakdown=66.7V, Add into BOM=yes, Convert to PCB=yes, Datasheet=https://atta.szlcsc.com/upload/public/pdf/source/20181114/C309994_0BBF6B3C1D339796B104E4710E56EEA8.pdf, Device=SMBJ60CA/TR13, Manufacturer Part=SMBJ60CA/TR13, Supplier=LCSC, Supplier Footprint=SMB(DO-214AA), Supplier Part=C309977, Symbol=SMBJ60CA_C309977, Type=TVS
D5: Average Rectified Current (Io)=5A, Forward Voltage (Vf@If)=550mV@5A, JLCPCB Part Class=扩展库, LCSC Part Name="电压:40V 电流:5A", Manufacturer=DIODES(美台), Reverse Leakage Current (Ir)=500uA@40V, Reverse Voltage (Vr)=40V, Add into BOM=yes, Convert to PCB=yes, Datasheet=https://atta.szlcsc.com/upload/public/pdf/source/20171023/C134461_15087453602301052556.pdf, Device=B540C-13-F, Manufacturer Part=B540C-13-F, Supplier=LCSC, Supplier Footprint=SMC(DO-214AB), Supplier Part=C72264, Symbol=B540C-13-F
D6: library part SMBJ5.0CA_C19077559, "C19077559", Clamping Voltage=9.2V, JLCPCB Part Class=扩展库, LCSC Part Name="双向TVS 5V截止 峰值浪涌电流：65.22A@10/1000us", Manufacturer=R+O(宏嘉诚), Operating Temperature=-55℃~+150℃, Peak Pulse Current (Ipp)=65.22A@10/1000us, Peak Pulse Power Dissipation (Ppp)=600W@10/1000us, Reverse Leakage Current (Ir)=800uA, Reverse Stand-Off Voltage (Vrwm)=5V, Voltage - Breakdown=7V, Add into BOM=yes, Convert to PCB=yes, Datasheet=https://item.szlcsc.com/datasheet/SMBJ5.0CA/20275644.html, Device=SMBJ5.0CA_C19077559, level of protection="IEC 61000-4-2", Manufacturer Part=SMBJ5.0CA, Polarity=双向, Supplier=LCSC, Supplier Footprint=DO-214AA(SMB), Supplier Part=C19077559, Symbol=SMBJ5.0CA_C19077559, Type=TVS
L1 L2 L3: library part CYA1265-6.8UH, "TDK_6.8UH_10A", Symbol=CYA1265-6.8UH
L4: library part FXL0630-150-M, "FXL0630-150-M", DC Resistance (DCR)=115mΩ, JLCPCB Part Class=扩展库, LCSC Part Name="15uH ±20% 4.5A", Manufacturer=cjiang(长江微电), Rated Current=3A, Saturation Current (Isat)=4.5A, Tolerance=±20%, Add into BOM=yes, Convert to PCB=yes, Datasheet=https://atta.szlcsc.com/upload/public/pdf/source/20240426/3189EA8206330E2108542F9E34E540E7.pdf, Device=FXL0630-150-M, Manufacturer Part=FXL0630-150-M, Supplier=LCSC, Supplier Footprint=SMD,6.6x7mm, Supplier Part=C177243, Symbol=FXL0630-150-M, Type=一体成型电感
LED1 LED2 LED3 LED4 LED5: Color Temperature=-, Emitted Color=红色, JLCPCB Part Class=基础库, LCSC Part Name="0603 红灯 高亮", Manufacturer=KENTO, Operating Temperature=-40℃~+85℃, Add into BOM=yes, Convert to PCB=yes, Datasheet=https://atta.szlcsc.com/upload/public/pdf/source/20160616/1466072038404.pdf, Device=KT-0603R, Diode Configuration=-, Dominant Wavelength=-, Forward Current=-, Lens Color=-, Manufacturer Part=KT-0603R, Mounting Sytle=-, Peak Wavelength=-, Power Dissipation=-, Supplier=LCSC, Supplier Footprint=0603, Supplier Part=C2286, Symbol=KT-0603R, Viewing Angle=-
R1: library part 0603WAF1472T5E, "0603WAF1472T5E", JLCPCB Part Class=扩展库, LCSC Part Name="14.7kΩ ±1% 100mW 厚膜电阻", Manufacturer=UNI-ROYAL(厚声), Operating Temperature Range=-55℃~+155℃, Overload Voltage (Max)=75V, Power(Watts)=100mW, Temperature Coefficient=±100ppm/℃, Tolerance=±1%, Add into BOM=yes, Convert to PCB=yes, Datasheet=https://atta.szlcsc.com/upload/public/pdf/source/20200306/C422600_1E6D84923E4A46A82E41ADD87F860B5C.pdf, Device=0603WAF1472T5E, Manufacturer Part=0603WAF1472T5E, Supplier=LCSC, Supplier Footprint=0603, Supplier Part=C22874, Symbol=0603WAF1472T5E, Type=厚膜电阻
R2: library part 0603WAF4023T5E, "0603WAF4023T5E", JLCPCB Part Class=扩展库, LCSC Part Name="402kΩ ±1% 100mW 厚膜电阻", Manufacturer=UNI-ROYAL(厚声), Operating Temperature Range=-55℃~+155℃, Overload Voltage (Max)=75V, Power(Watts)=100mW, Temperature Coefficient=±100ppm/℃, Tolerance=±1%, Add into BOM=yes, Convert to PCB=yes, Datasheet=https://atta.szlcsc.com/upload/public/pdf/source/20200306/C422600_1E6D84923E4A46A82E41ADD87F860B5C.pdf, Device=0603WAF4023T5E, Manufacturer Part=0603WAF4023T5E, Supplier=LCSC, Supplier Footprint=0603, Supplier Part=C23048, Symbol=0603WAF4023T5E, Type=厚膜电阻
R3: library part FRC0603F1002TS, "FRC0603F1002TS", Symbol=FRC0603F1002TS
R4 R5 R6 R7 R8 R9 R11 R12 R13 R14 R15 R16 R17 R18 R19 R20 R21 R22 R23 R24 R25 R27 R28 R33 R34 R35 R36 R37 R39 R41 R43 R45 R48 R49 R50 R51: library part RSMT0001, "Resistor", Manufacturer 1=Panasonic, Manufacturer 2="NIC Components", Manufacturer 4="Stackpole Electronics Inc", Manufacturer 5=Vishay, Manufacturer 7=Yageo, Manufacturer 8="KOA Speer", Manufacturer 9=ROHM, Manufacturer Part Number 1=ERJ-3GSY0R00V, Manufacturer Part Number 2=NRC06Z0TRF, Manufacturer Part Number 3=ERJ-3GEY0R00V, Manufacturer Part Number 4=RMCF0603ZT0R00, Manufacturer Part Number 5=CRCW06030000Z0EA, Manufacturer Part Number 6="RMCF 1/16 0 R", Manufacturer Part Number 7=RC0603JR-070RL, Manufacturer Part Number 8=RK73Z1JTTP, Manufacturer Part Number 9=MCR03EZPJ000, Operating Temperature="-55C to +155C", Package=0603, Power=1/10W, Category=Resistor, ComponentLink1Description=Datasheet, ComponentLink1URL=https://chn-vm-apps.microchip.com/mchprepo/parts/Datasheets/nrc.pdf, Composition=TKF, Description_="RES TKF 0R 1/10W SMD 0603", Manufacturer 3=Panasonic, Manufacturer 6="Stackpole Electronics Inc", MCHP-ID=RSMT0001, Populated=Yes, Quantity Override=1, Revision=2, Status=Production, Supplier 1=Digi-Key, Supplier 2="NIC Components", Supplier 3=Digi-Key, Supplier 4=Digi-Key, Supplier 5=Digi-Key, Supplier 6=Digi-Key, Supplier 7=Digi-Key, Supplier 8="KOA Speer", Supplier 9=Digi-Key, Supplier Part Number 1=NRC06Z0TRF, Supplier Part Number 2=P0.0GTR-ND, Supplier Part Number 3=RMCF0603ZT0R00TR-ND, Supplier Part Number 4=RMCF0603ZT0R00CT-ND, Supplier Part Number 5=541-0.0GCT-ND, Supplier Part Number 6=RMCF1/160RTR-ND, Supplier Part Number 7=311-0.0GRCT-ND, Supplier Part Number 8=RK73Z1JTTP, Supplier Part Number 9=RHM0.0GCT-ND, Type="RES SMD"
R26: library part 1206W4F1002T5E, "1206W4F1002T5E", JLCPCB Part Class=基础库, LCSC Part Name="10kΩ ±1% 250mW 厚膜电阻", Manufacturer=UNI-ROYAL(厚声), Operating Temperature Range=-55℃~+155℃, Overload Voltage (Max)=200V, Power(Watts)=250mW, Temperature Coefficient=±100ppm/℃, Tolerance=±1%, Add into BOM=yes, Convert to PCB=yes, Datasheet=https://atta.szlcsc.com/upload/public/pdf/source/20200306/C422600_1E6D84923E4A46A82E41ADD87F860B5C.pdf, Device=1206W4F1002T5E, Manufacturer Part=1206W4F1002T5E, Supplier=LCSC, Supplier Footprint=1206, Supplier Part=C17902, Symbol=1206W4F1002T5E, Type=厚膜电阻
R29: library part 0603WAF5100T5E, "0603WAF5100T5E", JLCPCB Part Class=基础库, LCSC Part Name="510Ω ±1% 100mW 厚膜电阻", Manufacturer=UNI-ROYAL(厚声), Operating Temperature Range=-55℃~+155℃, Overload Voltage (Max)=75V, Power(Watts)=100mW, Temperature Coefficient=±100ppm/℃, Tolerance=±1%, Add into BOM=yes, Convert to PCB=yes, Datasheet=https://atta.szlcsc.com/upload/public/pdf/source/20200306/C422600_1E6D84923E4A46A82E41ADD87F860B5C.pdf, Device=0603WAF5100T5E, Manufacturer Part=0603WAF5100T5E, Supplier=LCSC, Supplier Footprint=0603, Supplier Part=C23193, Symbol=0603WAF5100T5E, Type=厚膜电阻
R30 R31 R32: library part "FRC1206J332 TS", "FRC1206J332 TS", JLCPCB Part Class=扩展库, LCSC Part Name="3.3kΩ ±5% 250mW 厚膜电阻", Manufacturer=FOJAN(富捷), Operating Temperature Range=-55℃~+155℃, Overload Voltage (Max)=200V, Power(Watts)=250mW, Temperature Coefficient=±100ppm/℃, Tolerance=±5%, Add into BOM=yes, Convert to PCB=yes, Datasheet=https://atta.szlcsc.com/upload/public/pdf/source/20211221/925EC7D7225764EE0046F22065062C87.pdf, Device="FRC1206J332 TS", Manufacturer Part="FRC1206J332 TS", Supplier=LCSC, Supplier Footprint=1206, Supplier Part=C2907469, Symbol="FRC1206J332 TS", Type=厚膜电阻
R38: library part 0402WGF5362TCE, "0402WGF5362TCE", JLCPCB Part Class=扩展库, LCSC Part Name="53.6kΩ ±1% 62.5mW 厚膜电阻", Manufacturer=UNI-ROYAL(厚声), Operating Temperature Range=-55℃~+155℃, Overload Voltage (Max)=50V, Power(Watts)=62.5mW, Temperature Coefficient=±100ppm/℃, Tolerance=±1%, Add into BOM=yes, Convert to PCB=yes, Datasheet=https://atta.szlcsc.com/upload/public/pdf/source/20200306/C422600_1E6D84923E4A46A82E41ADD87F860B5C.pdf, Device=0402WGF5362TCE, Manufacturer Part=0402WGF5362TCE, Supplier=LCSC, Supplier Footprint=0402, Supplier Part=C53398, Symbol=0402WGF5362TCE, Type=厚膜电阻
R40: library part 0603WAF5113T5E, "0603WAF5113T5E", JLCPCB Part Class=扩展库, LCSC Part Name="511kΩ ±1% 100mW 厚膜电阻", Manufacturer=UNI-ROYAL(厚声), Operating Temperature Range=-55℃~+155℃, Overload Voltage (Max)=75V, Power(Watts)=100mW, Temperature Coefficient=±100ppm/℃, Tolerance=±1%, Add into BOM=yes, Convert to PCB=yes, Datasheet=https://atta.szlcsc.com/upload/public/pdf/source/20200306/C422600_1E6D84923E4A46A82E41ADD87F860B5C.pdf, Device=0603WAF5113T5E, Manufacturer Part=0603WAF5113T5E, Supplier=LCSC, Supplier Footprint=0603, Supplier Part=C23194, Symbol=0603WAF5113T5E, Type=厚膜电阻
R42: library part 0603WAF1212T5E, "0603WAF1212T5E", JLCPCB Part Class=扩展库, LCSC Part Name="12.1kΩ ±1% 100mW 厚膜电阻", Manufacturer=UNI-ROYAL(厚声), Operating Temperature Range=-55℃~+155℃, Overload Voltage (Max)=75V, Power(Watts)=100mW, Temperature Coefficient=±100ppm/℃, Tolerance=±1%, Add into BOM=yes, Convert to PCB=yes, Datasheet=https://atta.szlcsc.com/upload/public/pdf/source/20200306/C422600_1E6D84923E4A46A82E41ADD87F860B5C.pdf, Device=0603WAF1212T5E, Manufacturer Part=0603WAF1212T5E, Supplier=LCSC, Supplier Footprint=0603, Supplier Part=C22864, Symbol=0603WAF1212T5E, Type=厚膜电阻
R44: library part 0603WAF1623T5E, "0603WAF1623T5E", JLCPCB Part Class=扩展库, LCSC Part Name="162kΩ ±1% 100mW 厚膜电阻", Manufacturer=UNI-ROYAL(厚声), Operating Temperature Range=-55℃~+155℃, Overload Voltage (Max)=75V, Power(Watts)=100mW, Temperature Coefficient=±100ppm/℃, Tolerance=±1%, Add into BOM=yes, Convert to PCB=yes, Datasheet=https://atta.szlcsc.com/upload/public/pdf/source/20200306/C422600_1E6D84923E4A46A82E41ADD87F860B5C.pdf, Device=0603WAF1623T5E, Manufacturer Part=0603WAF1623T5E, Supplier=LCSC, Supplier Footprint=0603, Supplier Part=C22815, Symbol=0603WAF1623T5E, Type=厚膜电阻
R46: library part 0603WAF1022T5E, "0603WAF1022T5E", JLCPCB Part Class=扩展库, LCSC Part Name="10.2kΩ ±1% 100mW 厚膜电阻", Manufacturer=UNI-ROYAL(厚声), Operating Temperature Range=-55℃~+155℃, Overload Voltage (Max)=75V, Power(Watts)=100mW, Temperature Coefficient=±100ppm/℃, Tolerance=±1%, Add into BOM=yes, Convert to PCB=yes, Datasheet=https://atta.szlcsc.com/upload/public/pdf/source/20200306/C422600_1E6D84923E4A46A82E41ADD87F860B5C.pdf, Device=0603WAF1022T5E, Manufacturer Part=0603WAF1022T5E, Supplier=LCSC, Supplier Footprint=0603, Supplier Part=C22772, Symbol=0603WAF1022T5E, Type=厚膜电阻
R47: library part 0603WAF8252T5E, "0603WAF8252T5E", JLCPCB Part Class=扩展库, LCSC Part Name="82.5kΩ ±1% 100mW 厚膜电阻", Manufacturer=UNI-ROYAL(厚声), Operating Temperature Range=-55℃~+155℃, Overload Voltage (Max)=75V, Power(Watts)=100mW, Temperature Coefficient=±100ppm/℃, Tolerance=±1%, Add into BOM=yes, Convert to PCB=yes, Datasheet=https://atta.szlcsc.com/upload/public/pdf/source/20200306/C422600_1E6D84923E4A46A82E41ADD87F860B5C.pdf, Device=0603WAF8252T5E, Manufacturer Part=0603WAF8252T5E, Supplier=LCSC, Supplier Footprint=0603, Supplier Part=C23251, Symbol=0603WAF8252T5E, Type=厚膜电阻
U1 U3 U4 U5 U6 U7 U8: JLCPCB Part Class="Extended Part", AddInBom=yes, ConvertToPcb=yes, Supplier=LCSC, Supplier Footprint=插件
  U1 U8: Device=XT60PW-M30.G.Y, FootprintName=CONN-TH_XT60PW-M, LCSC Part Name=XT60PW-M30.G.Y, ManufacturerPart=XT60PW-M30.G.Y, ModelId=37912d55e50045169535334d164bae93聨0819f05c4eef4c71ace90d822a990e87, ModelName=CONN-TH_XT60PW-M, ModelTransform=712.597,610.235,0,0,0,0,-161.417,0,-118.11, SupplierPart=C7204007, Symbol=XT60PW-M30.G.Y
  U3 U4 U5 U6 U7: Device=XT30PW(2+2)-M.G/B, FootprintName=CONN-TH_4P-XT30PW-M, LCSC Part Name=XT30PW(2+2)-M.G/B, ManufacturerPart=XT30PW(2+2)-M.G/B, ModelId=f8fe1fea84414ff6ba064cb65694a64e聨0819f05c4eef4c71ace90d822a990e87, ModelName=CONN-TH_4P-XT30PW-M, ModelTransform=610.235,493.306,0,0,0,0,-6.772,-151.575,-78.74, SupplierPart=C19189446, Symbol=XT30PW(2+2)-M.G/B
U9 U11: library part 2053380002, Symbol=2053380002
U10 U20: JLCPCB Part Class="Extended Part", LCSC Part Name="AMASS(艾迈斯)XT30UW防水锁扣镀金15A二芯母插头 母头XT30UW-F.G.Y", Manufacturer=AMASS(艾迈斯), AddInBom=yes, ConvertToPcb=yes, Datasheet=https://item.szlcsc.com/datasheet/XT30UW-F.G.Y/20526036.html, Device=XT30UW-F.G.Y, FootprintName=CONN-TH_XT30UW-F.G.Y, ManufacturerPart=XT30UW-F.G.Y, ModelId=b4d6908f3e7e4811a3e6138fa49d688c聨0819f05c4eef4c71ace90d822a990e87, ModelName=CONN-TH_XT30UW-F.G.Y, ModelTransform=401.574,202.7555,0,0,0,0,0,0,-118.11, Supplier=LCSC, Supplier Footprint=-, SupplierPart=C19268025, Symbol=XT30UW-F.G.Y
U14: "插针结构:1x8P;间距:2mm;安装方式:立贴;参考系列:PH;总PIN数:8P;排数:1;每排PIN数:8;行距:-;额定电流:2A;触头材质:黄铜;触头镀层:锡;工作温度:-25℃~+85℃;", Color=米色, Current Rating=2A, Flame Retardant Rating=-, JLCPCB Part Class="Extended Part", LCSC Part Name="1x8P 间距:2mm 立贴 系列:PH", Manufacturer=Bossie(博锡), ManufacturerPart=BX-PH2.0-8PLT, Operating Temperature=-25℃~+85℃, Voltage Rating=250V, AddInBom=yes, Contact Material=黄铜, Contact Plating=锡, ConvertToPcb=yes, Datasheet=https://item.szlcsc.com/datasheet/BX-PH2.0-8PLT/19218306.html, FootprintName=CONN-SMD_8P-P2.00_BX-PH2.0-8PLT, ModelId=14b3e0e37b864a5c9a0170aaaeedfe72, ModelName=CONN-SMD_8P-P2.00_BX-PH2.0-8PLT, ModelTransform=787.4,295.6687,0,0,0,0,0.001,-34.252,0, Mounting Type=立贴, Number of Pins=8P, Number of PINs Per Row=8, Number of Rows=1, Pins Structure=1x8P, Pitch=2mm, Plastic Material=LCP, Reference Series=PH, Row Spacing=-, Supplementary Features=辅助焊脚, Supplier=LCSC, Supplier Footprint=SMD,P=2mm, SupplierPart=C18077905, Symbol=BX-PH2.0-8PLT, X-Length of Bottom Edge on Board (Spacing Line)=20mm, Y-Width of Bottom Edge on Board=7.5mm, Z-Height of the Board=6.3mm
U16: "插针结构:1x4P;间距:1.25mm;安装方式:卧贴;参考系列:GH;总PIN数:4P;排数:1;每排PIN数:4;行距:-;额定电流:1A;触头材质:黄铜;触头镀层:锡;工作温度:-25℃~+85℃;", Color=米色, Current Rating=1A, Flame Retardant Rating=-, JLCPCB Part Class="Extended Part", LCSC Part Name="1x4P 间距:1.25mm 卧贴 系列:GH", Manufacturer=XUNPU(讯普), Operating Temperature=-25℃~+85℃, Voltage Rating=125V, AddInBom=yes, Contact Material=黄铜, Contact Plating=锡, ConvertToPcb=yes, Datasheet=https://item.szlcsc.com/datasheet/WAFER-GH1.25-4PWB/3561391.html, Device=WAFER-GH1.25-4PWB, FootprintName=CONN-SMD_4P-P1.25_XUNPU_WAFER-GH1.25-4PWB, ManufacturerPart=WAFER-GH1.25-4PWB, ModelId=7513cf7b15b743f8816b10e1669263ec聨0819f05c4eef4c71ace90d822a990e87, ModelName=CONN-SMD_4P-P1.25_XUNPU_WAFER-GH1.25-4PWB, ModelTransform=324.8025,196.85,0,0,0,0,0.001,-28.937,0, Mounting Type=卧贴, Number of Pins=4P, Number of PINs Per Row=4, Number of Rows=1, Pins Structure=1x4P, Pitch=1.25mm, Plastic Material=LCP, Reference Series=GH, Row Spacing=-, Supplementary Features=辅助焊脚, Supplier=LCSC, Supplier Footprint=SMD,P=1.25mm,卧贴, SupplierPart=C3029379, Symbol=WAFER-GH1.25-4PWB, X-Length of Bottom Edge on Board (Spacing Line)=8.25mm, Y-Width of Bottom Edge on Board=5mm, Z-Height of the Board=4.35mm
U18: Input Voltage=4.5V~60V, JLCPCB Part Class=扩展库, Manufacturer=TI(德州仪器), Operating Temperature=-40℃~+150℃@(TJ), Output Current (Max)=5A, Output Voltage=800mV~58.8V, Switching Frequency=2.5MHz, Add into BOM=yes, Convert to PCB=yes, Datasheet=https://www.ti.com/cn/lit/gpn/tps54560, Device=TPS54560DDAR, Function=降压型, LCSC Part Name=TPS54560DDAR, Manufacturer Part=TPS54560DDAR, Number of Outputs=1, Output Type=可调, Supplier=LCSC, Supplier Footprint=SOIC-8-EP, Supplier Part=C31966, Switch tube (built-in/external)=内置, Symbol=TPS54560DDAR, Synchronous Rectification=否, Topology=降压式
CN1 CN2 CN3 CN4: Symbol=SM03B-NSHSS-TB(LF)(SN)
Q1 Q4 Q6: Symbol=NVMFS6H848NLT1G
Q2 Q3 Q5: Symbol=NVMFS6H858NLT1G
U2 U13 U17: Symbol=LM5148RGYR
U12 U19: AddInBom=yes, ConvertToPcb=yes, Device=XT30PW-M36, FootprintName=CONN-TH_2P-P5.00_XT30PW-M36, LCSC Part Name=XT30PW-M36, ManufacturerPart=XT30PW-M36, ModelId=3acea756d5b2467796cb368fa64d4ccc聨0819f05c4eef4c71ace90d822a990e87, ModelName=CONN-TH_2P-P5.00_XT30PW-M36, ModelTransform=405.905,507.87304,0,0,0,0,-0.005,-224.409,-137.795, Supplier=LCSC, Supplier Footprint=XT30, SupplierPart=C9900222726, Symbol=XT30PW-M36
U15: Symbol=BX-SH1.0-5PLT

## Free pads (board coordinates)
  round 236.22 hole 133.86: 0(275.59,157.48) 0(275.59,4374.02) 0(5514.61,157.48) 0(5514.61,4374.02)
  round 149.61 hole 86.61: 1(1999.09,1490.59) 1(1999.09,3263.03) 1(3717.44,1490.59) 1(3717.44,3263.03)

## Via types
v1: diameter 24, hole 12, Top Layer to Bottom Layer, tented both sides, 1202 vias

## Nets (pads, with @x,y where several pads share a name; then routed paths per layer and width w, separated by ;. In a path a pad name is that pad's centre, name@x,y a point inside that pad or via, vN(x,y) a via of type N, cw(c..) or ccw(c..) an arc to the next point about the centre after c; other vN are vias at no path point)
5V: C83.2 C84.2 C85.2 C86.2 C87.2 C88.2 C89.2 C90.2 C91.2 D6.2 L4.2 LED2.2 R38.2 U16.1 | length 1550.5
  Top Layer w20: v1(945.12,3670.12) LED2.2@988.81,3670.12 ; R38.2@1610,4157.5 v1(1610,4205)
  Bottom Layer w20: v1(670,4430) 1560,4430 1610,4380 v1(1610,4205) ; v1(900,3975) 945.12,3929.88 v1(945.12,3670.12)
  other v1: 160,1120 210,1120 670,3985 735,3985 670,4030 735,4030
12V: C32.2 C33.2 C34.2 C35.1 C36.1 C37.1 C38.1 C39.1 C41.1 LED3.2 R5.1 R51.1 U2.21 U9.1 U10.2 U11.1 U20.2 | length 2927.1
  Top Layer w10: U2.21@1064.2,2759.7 1064.2,2735.8 v1(1090,2710)
  Top Layer w15: C35.1@1080,1982.3 1257.3,1982.3 1375,2100 1375,2405 ; C41.1@1142.5,3060 1142.5,3119.99 1142.5,3152.5 1165,3175 1335,3175 1375,3135 1375,2405 ; 1375.63,2404.37 1375,2405
  Bottom Layer w7: v1(430,2020) 455,2045 750,2045 1084.12,2379.12 v1@1084.12,2704.12
  Bottom Layer w10: v1@1084.12,2704.12 v1(1090,2710)
16-2V: C53.2 C54.2 C55.2 C56.1 C57.1 C58.1 C59.1 C60.1 C63.1 LED4.2 R17.1 R23.1 U13.21 U19.1 | length 2916.1
  Top Layer w7: v1(4516,2915) 4520,2915 4520,2911.28 4550.8,2880.48 U13.21@4550.8,2865.3
  Top Layer w15: LED4.2@4081.48,3760.14 4224.86,3760.14 ; 4275,3555.12 4275,2485 4310,2450 4480,2450 4507.5,2477.5 R23.1@4507.5,2525 C63.1@4507.5,2575
  Bottom Layer w7: v1(4516,2915) 4523.64,2922.64 4523.64,3123.64 4665,3265 5300,3265 5372.87,3337.87 5372.87,3390.26 5348.13,3415 v1(5305,3415)
16-3V: C75.2 C76.2 C77.2 C78.1 C79.1 C80.1 C81.1 C82.1 C93.1 LED5.2 R35.1 R41.1 U12.1 U17.21 | length 2717.9
  Top Layer w7: v1(4516,1545) 4520,1545 4520,1541.28 4550.8,1510.48 U17.21@4550.8,1495.3
  Top Layer w15: 4275,2145 4275,1170.07 4342.29,1102.77 4485.76,1102.77 4507.5,1124.52 C93.1@4507.5,1155 R41.1@4507.5,1205
  Top Layer w20: v1(5583.52,1223.52) LED5.2@5583.52,1269.86
  Bottom Layer w7: v1(4516,1545) 4523.64,1552.64 4523.64,1753.64 4645,1875 5280,1875 5372.87,1967.87 5372.87,2020.26 5348.13,2045 v1(5305,2045)
  other v1: 5600,2270 5660,2270 5720,2270 5600,2320 5660,2320 5720,2320
48V: C2.2 C3.2 C4.2 C5.2 C6.2 C7.2 C8.2 C9.2 C10.2 C11.2 C12.2 C13.1 C14.1 C15.1 C16.1 C17.1 C18.1 C19.1 C20.1 C21.1 C22.1 C24.2 C25.2 C26.1 C27.1 C28.1 C29.1 C30.2 C45.2 C46.2 C47.1 C48.1 C49.1 C50.1 C51.2 C66.2 C67.2 C68.1 C69.1 C70.1 C71.1 C72.2 D1.1 D2.1 D3.1 D4.1 LED1.2 Q2.5 Q3.5 Q5.5 R2.2 R6.1 R7.2 R18.1 R19.2 R34.1 R36.2 R40.2 U1.2 U2.12 U3.1 U4.1 U5.1 U6.1 U7.1 U8.2 U13.12 U17.12 U18.2 | length 3272.6
  Top Layer w15: LED1.2@625.98,586.61 625.98,259.02 690,195 1215,195 ; v1(875,2855) 875.5,2854.5 U2.12@910.3,2854.5 ; R7.2@955,2582.5 955,2535 975,2515 1130,2515 v1(1160,2545) 1160,2562.5 R6.1@1140,2582.5 ; v1(1175,2790) R2.2@1222.5,2790 ; R40.2@1462.5,3700 1465,3702.5 U18.2@1465,3786 ; R34.1@4510,1677.5 4510,1723.67 4530.92,1744.59 4615.41,1744.59 v1(4650,1710) R36.2@4650,1677.5 ; R18.1@4510,3047.5 4510,3110 4535,3135 4620,3135 v1(4665,3090) R19.2@4665,3050
  Bottom Layer w15: v1(875,2855) 902.63,2882.63 1082.37,2882.63 v1(1175,2790) 1175,2560 v1(1160,2545) ; v1(4650,1710) 4655,1710 4725,1640 4725,1410 v1(4740,1395) ; v1(4665,3090) 4720,3035 4720,2785 v1(4740,2765)
  other v1: 4840,1290 4910,1290 4980,1290 5050,1290 5120,1290 5190,1290 5260,1290 5330,1290 4830,2660 4900,2660 4970,2660 5040,2660 5110,2660 5180,2660 5250,2660 5320,2660 420,2890 615,2890 415,2945 490,2945 565,2945 640,2945 715,2945 790,2945 1420,3660 1465,3660 1420,3700
CANH1: CN2.3 U5.3 | length 590.7
  Top Layer w5: CN2.3@1930.95,809.37 1944.63,795.68 1979.97,795.68 2007,768.66 2007,590.03 1870,453.03 1870,410.76 1885,395.76 1899.7,395.76 U5.3@1933.07,429.13
CANH2: CN3.3 U6.3 | length 581.7
  Top Layer w5: CN3.3@4670.94,809.37 4693.36,809.37 4707.04,795.68 4726.62,795.68 4747,775.31 4747,600.03 4655,508.03 4655,397.89 4665,387.89 4680,387.89 4712.6,420.49 U6.3@4712.6,421.26
CANH3: CN4.3 U3.3 | length 546
  Top Layer w5: U3.3@1817.72,4111.42 1817.72,4117.51 1845,4144.79 1858.36,4144.79 1870.03,4133.11 1870.03,4052 1738,3919.97 1738,3821.34 1770.03,3789.31 1788.2,3789.31 1801.89,3775.63 CN4.3@1824.05,3775.63
CANH4: CN1.3 U4.3 U7.3 | length 1754.5
  Top Layer w5: CN1.3@2979.06,3775.63 2957.29,3775.63 2943.6,3789.31 2920.38,3789.31 2905.65,3804.05 2905.65,3927.62 3053.87,4075.85 3053.87,4133.63 3042.72,4144.79 3024.32,4144.79 U4.3@2990.95,4111.42
  Bottom Layer w5: U4.3@2990.95,4111.42 3024.32,4144.79 4130.8,4144.79 U7.3@4161.42,4114.17
CANL1: CN2.2 U5.4 | length 590.7
  Top Layer w5: CN2.2@1930.95,770 1944.63,783.68 1975,783.68 1995,763.68 1995,595 1858,458 1858,405.79 1880.03,383.76 1899.7,383.76 U5.4@1933.07,350.39
CANL2: CN3.2 U6.4 | length 581.7
  Top Layer w5: CN3.2@4670.94,770 4692.81,770 4706.49,783.68 4721.65,783.68 4735,770.34 4735,605 4643,513 4643,392.92 4660.03,375.89 4680,375.89 4712.6,343.29 U6.4@4712.6,342.52
CANL3: CN4.2 U3.4 | length 546
  Top Layer w5: U3.4@1817.72,4190.16 1817.72,4184.07 1845,4156.79 1863.33,4156.79 1882.03,4138.08 1882.03,4047.03 1750,3915 1750,3826.31 1775,3801.31 1787.71,3801.31 1801.39,3815 CN4.2@1824.05,3815
CANL4: CN1.2 U4.4 U7.4 | length 1756.8
  Top Layer w5: CN1.2@2979.06,3815 2957.74,3815 2944.05,3801.31 2925.35,3801.31 2917.65,3809.02 2917.65,3922.65 3065.87,4070.87 3065.87,4138.6 3047.69,4156.79 3024.32,4156.79 U4.4@2990.95,4190.16
  Bottom Layer w5: U4.4@2990.95,4190.16 3024.32,4156.79 4125.29,4156.79 U7.4@4161.42,4192.91
COMP1: C42.1 R9.1 U2.5 | length 303.6
  Top Layer w7: U2.5@1044.5,2890.2 1044.5,2924.5 1090,2970 1192.5,2970 C42.1@1222.5,3000 R9.1@1222.5,3060
COMP2: C62.1 R20.1 U13.5 | length 271.5
  Top Layer w7: R20.1@4417.5,2575 C62.1@4417.5,2625 4452.5,2660 4535,2660 4570.5,2695.5 U13.5@4570.5,2734.8
COMP3: C94.1 R39.1 U17.5 | length 271.5
  Top Layer w7: R39.1@4417.5,1205 C94.1@4417.5,1255 4452.5,1290 4535,1290 4570.5,1325.5 U17.5@4570.5,1364.8
EN1: R3.1 R6.2 R8.1 U2.19 | length 300.7